# Altium PCB Smart-Switch-v1.2.PcbDoc (part 1 of 3)
Units mm, origin at the board's own origin, x right, y up, seen from the top; angles counter-clockwise.
Board outline 37 x 35 mm, 4 copper layers (Top Layer, Power Layer, Ground Layer, Bottom Layer), stack 0.999 mm thick; 78 components, 45 nets, 242 pads, 262 vias.
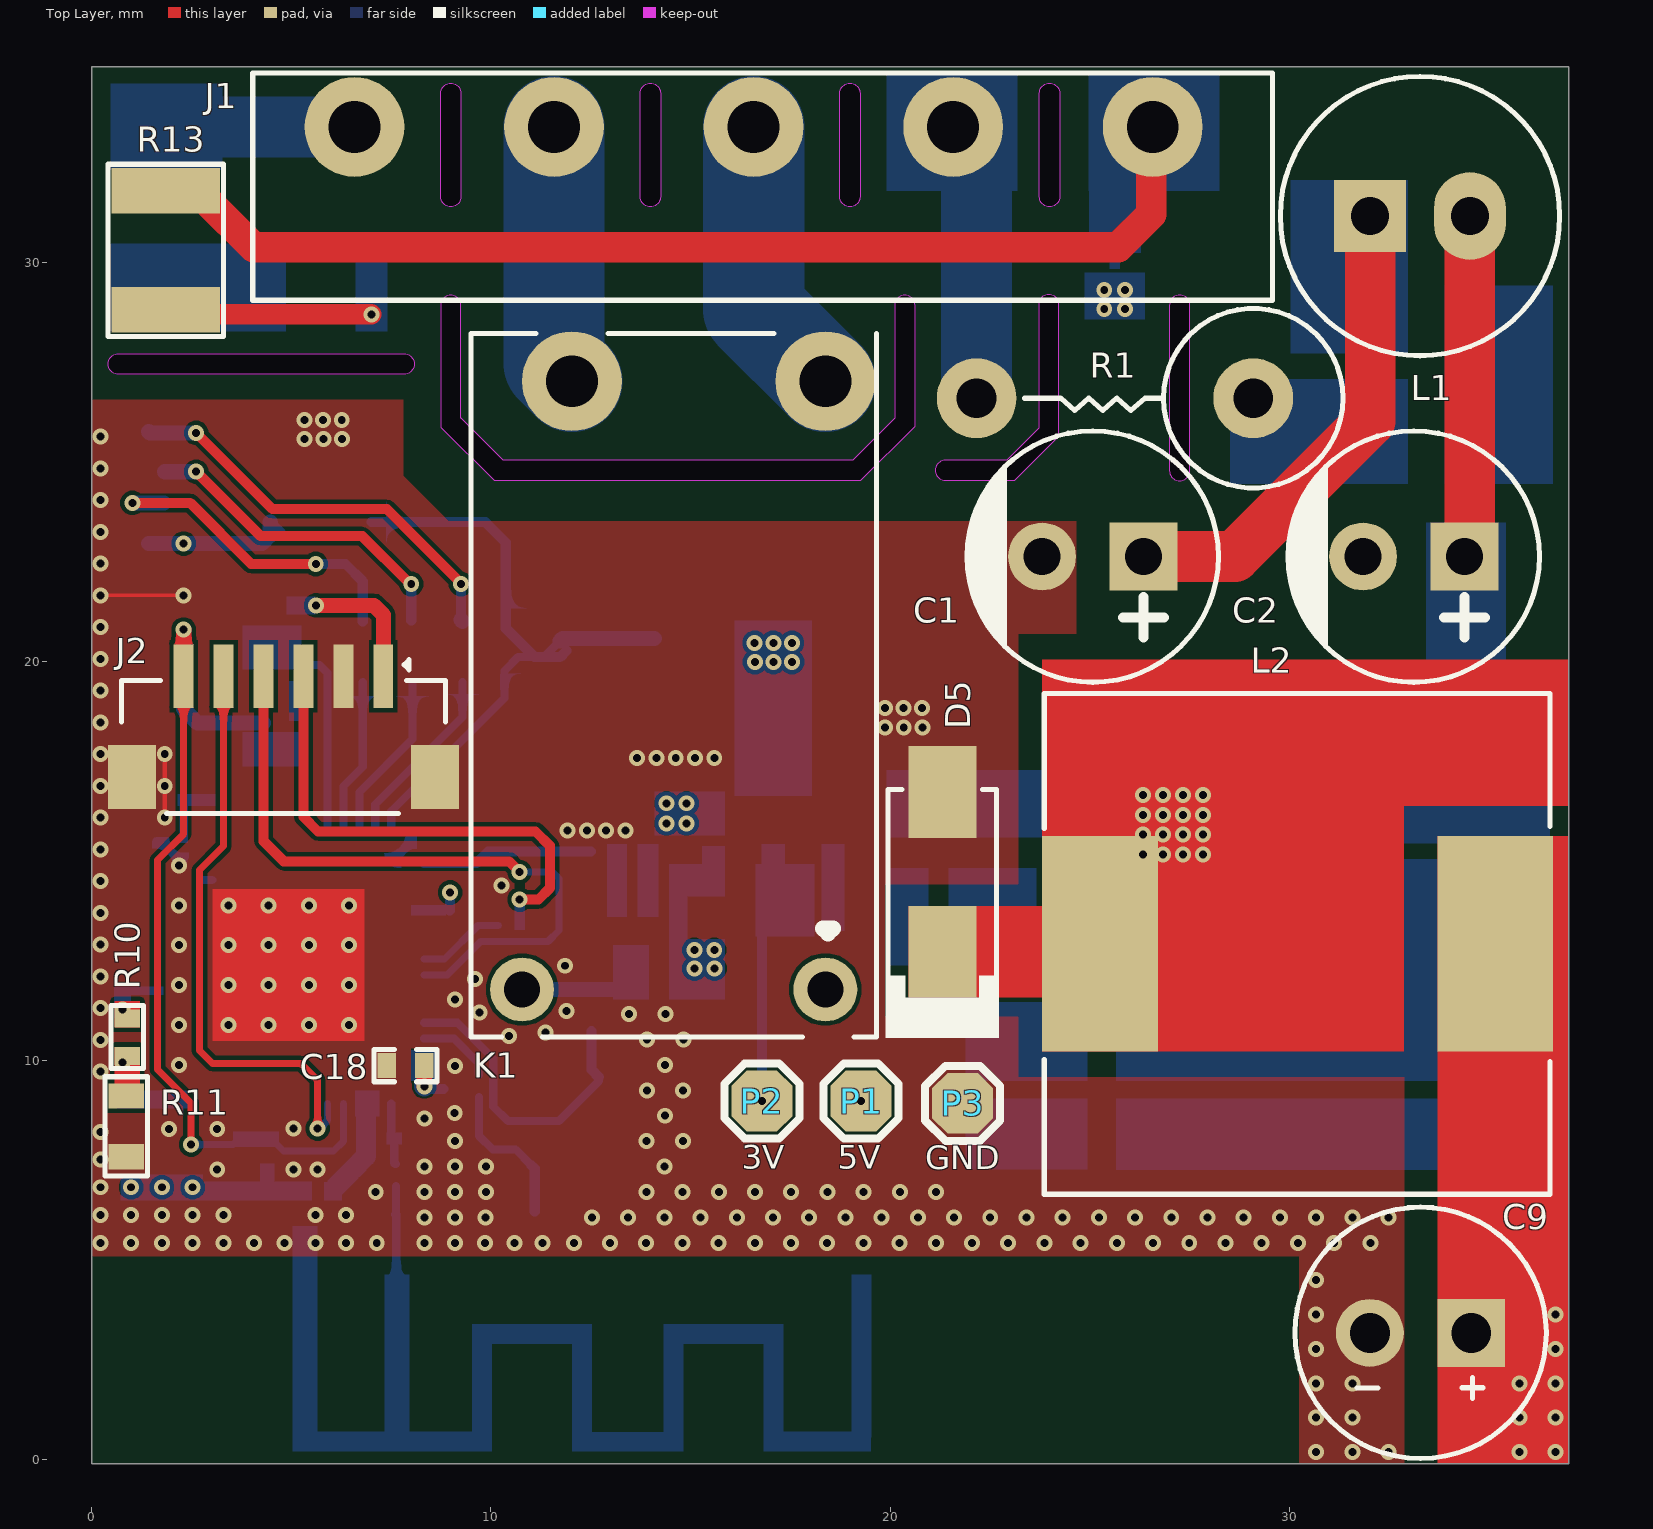
[diagram p0: Top Layer view]
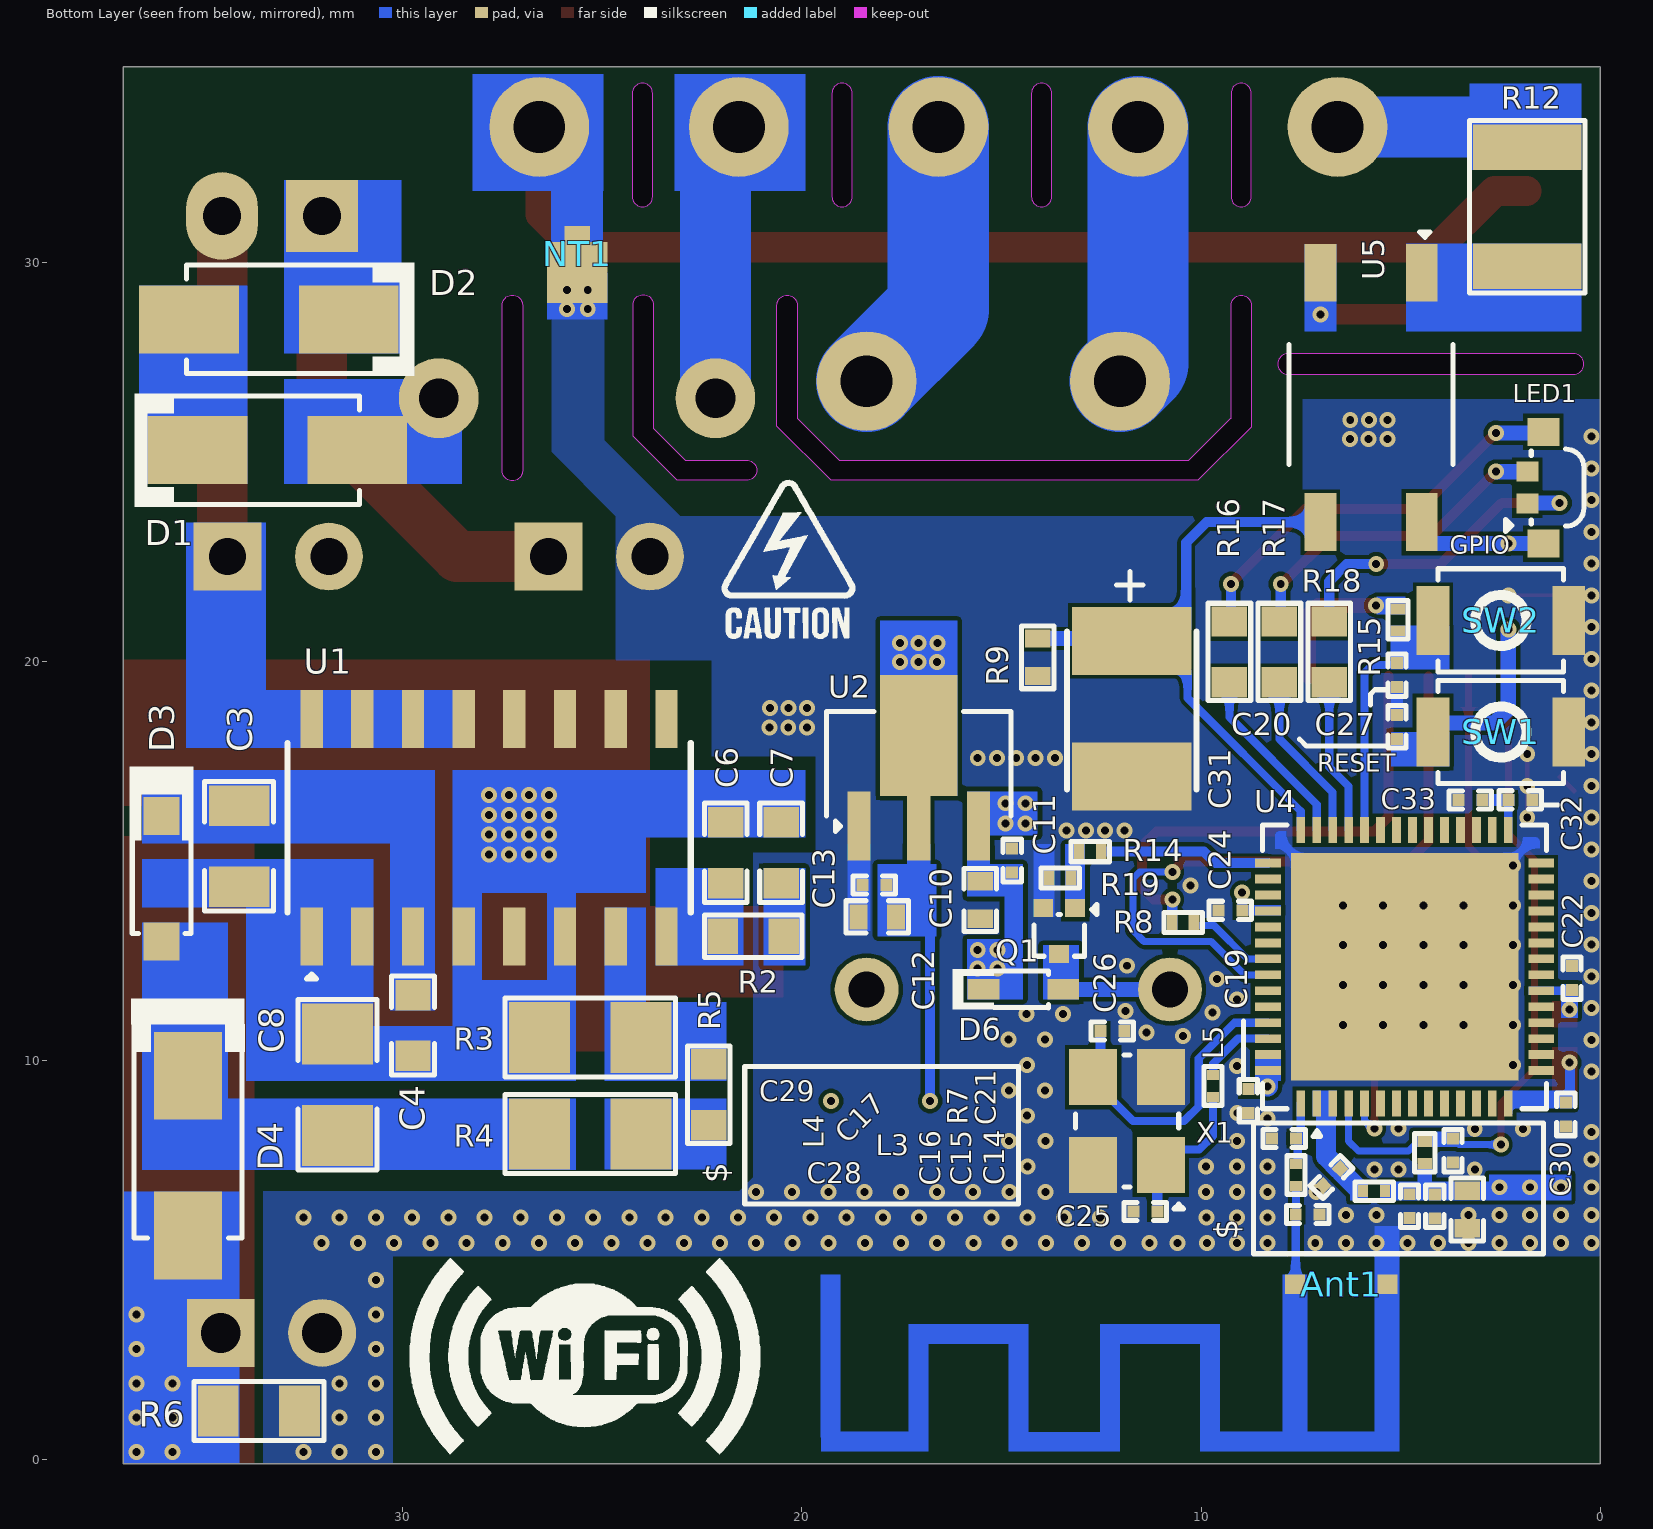
[diagram p1: Bottom Layer view, seen from below]
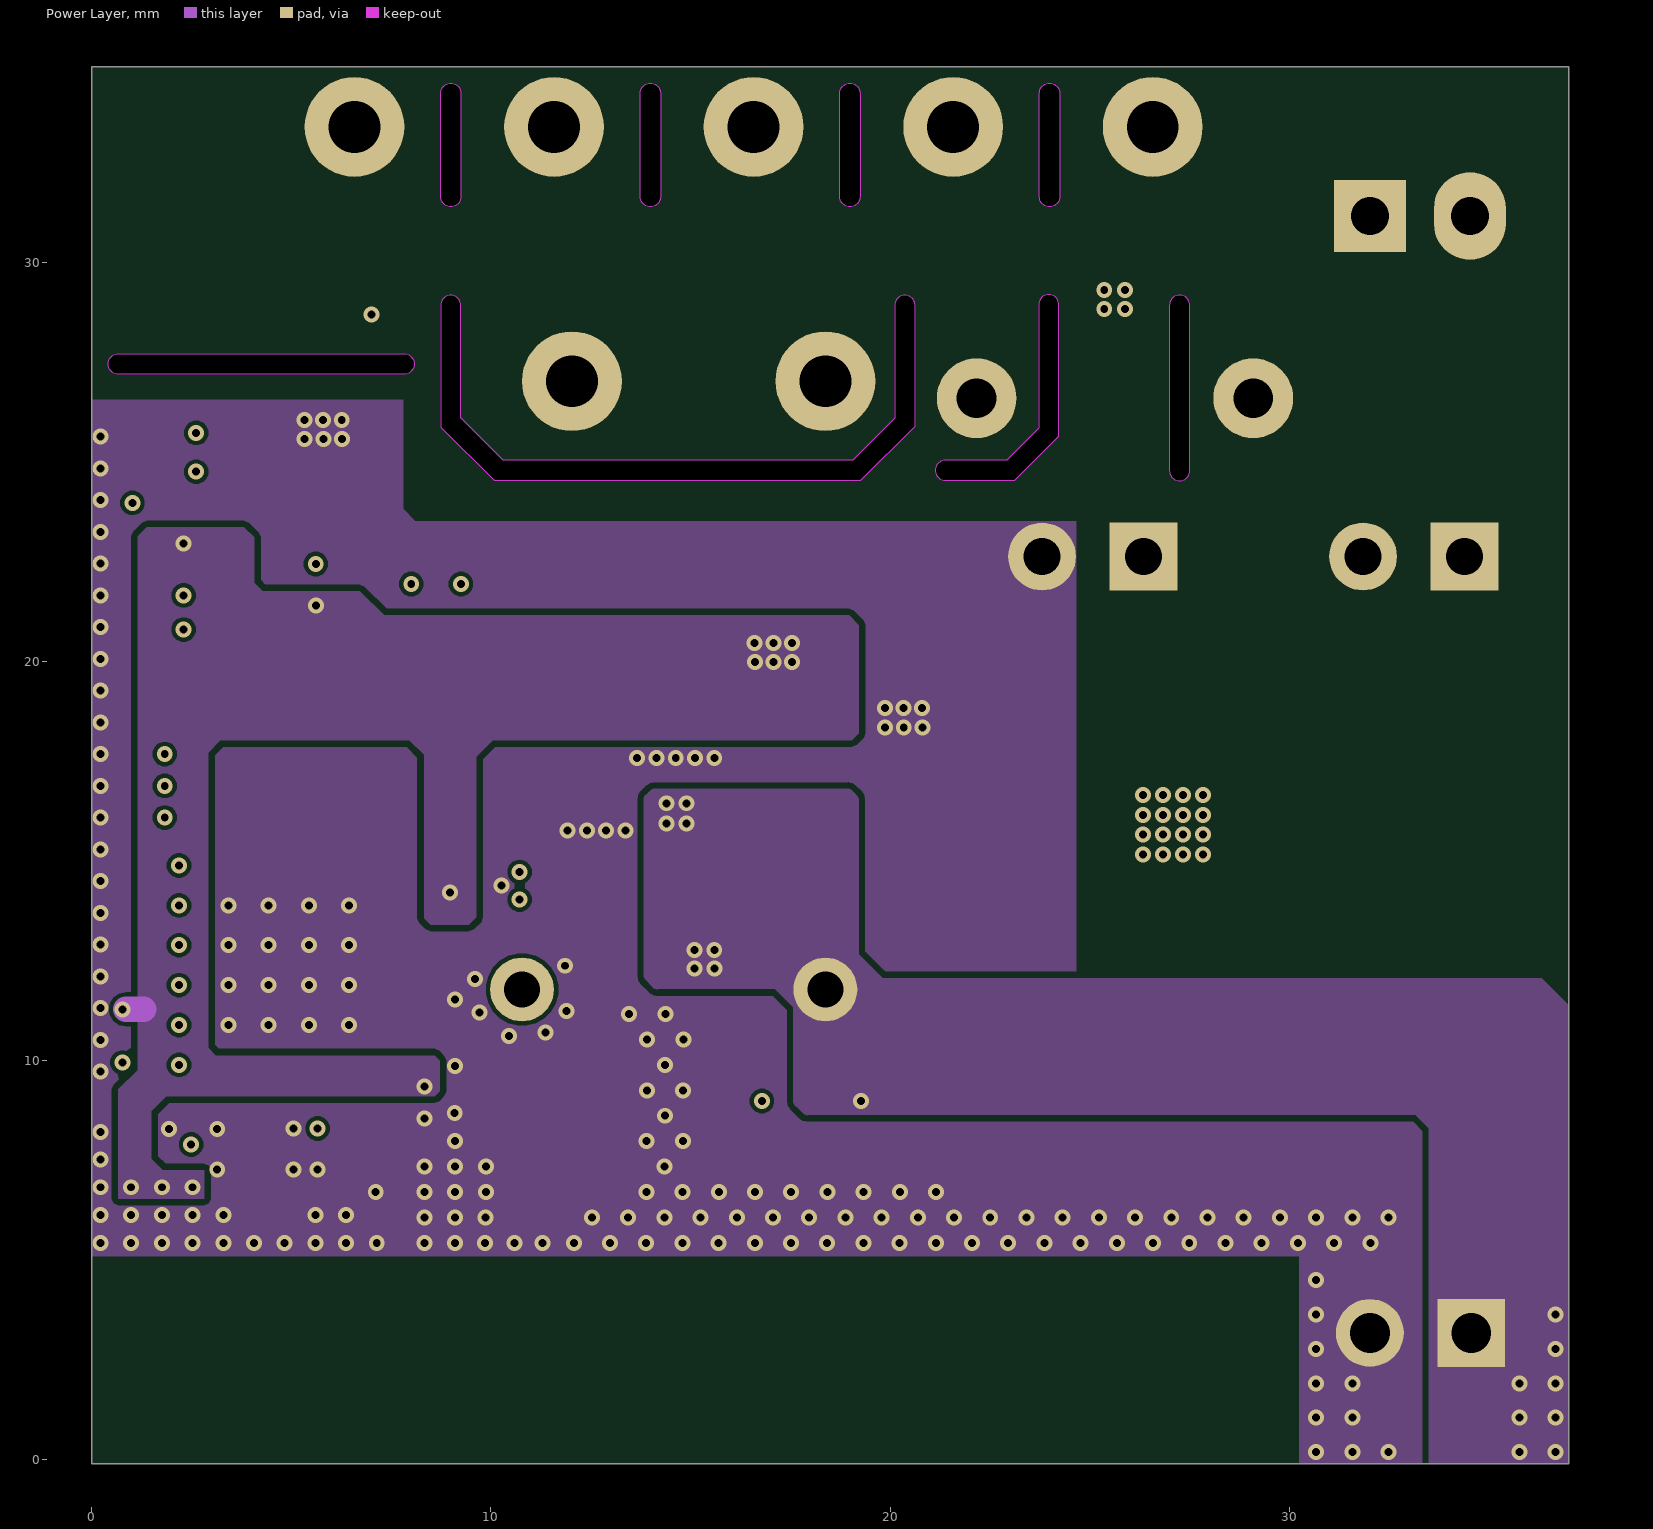
[diagram p2: Power Layer]
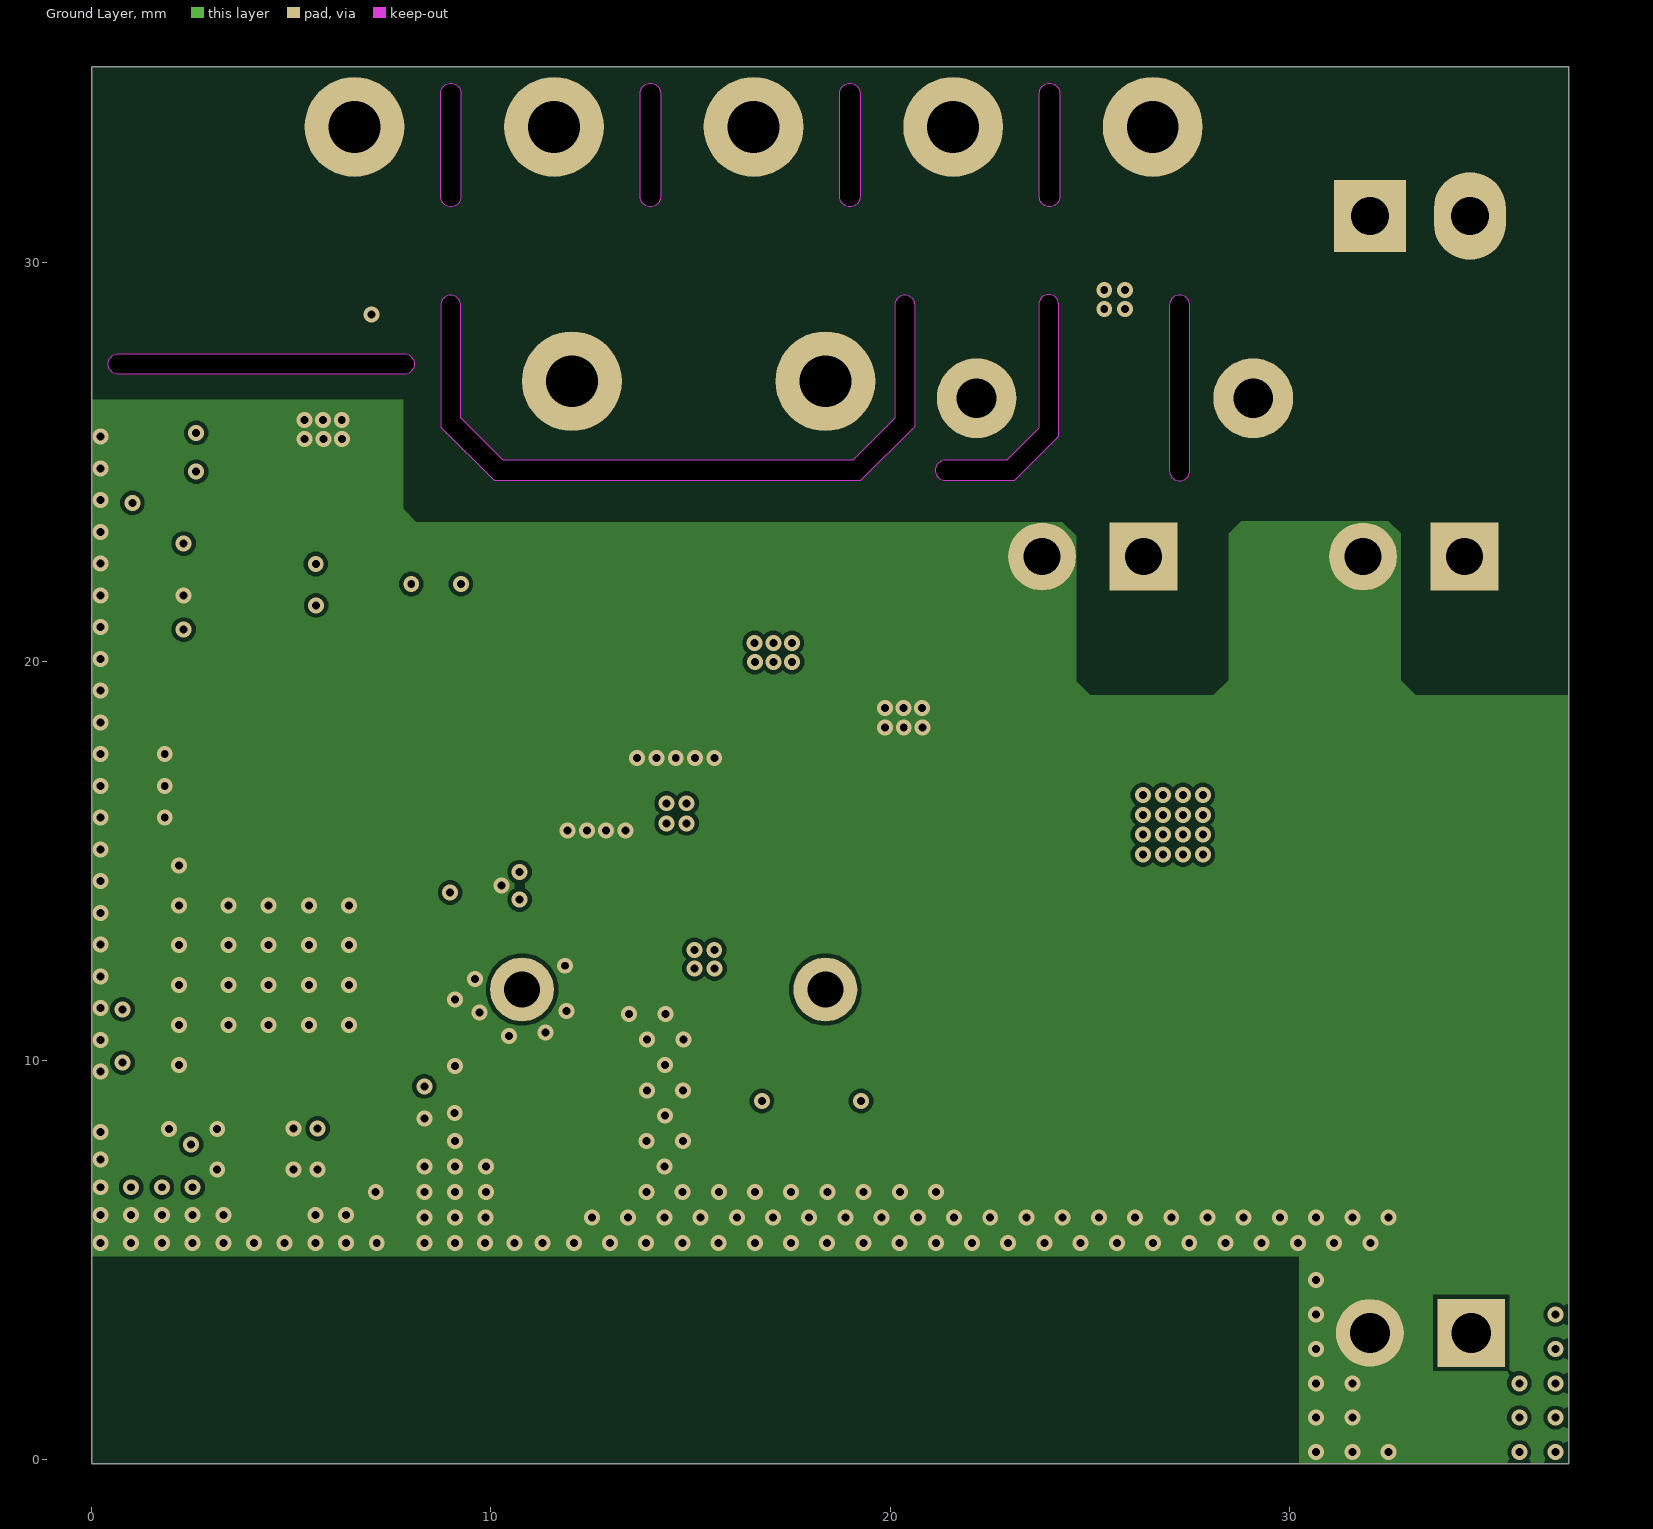
[diagram p3: Ground Layer]
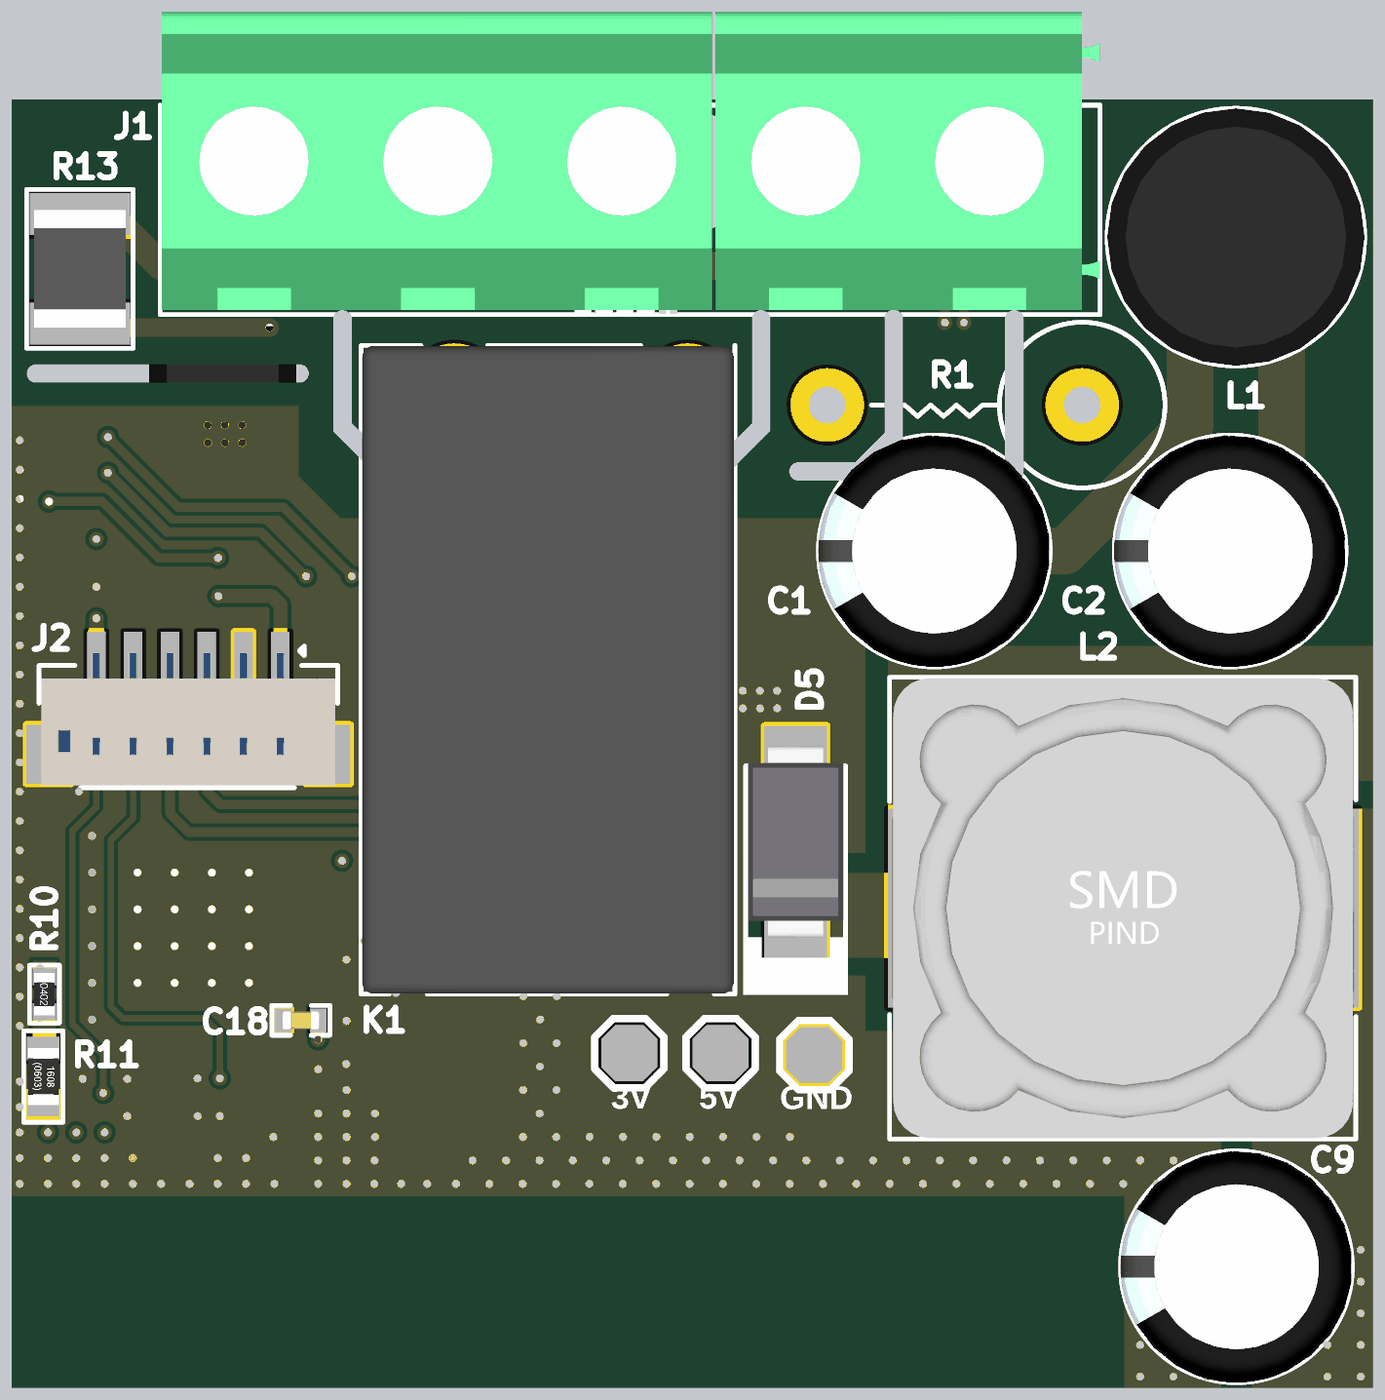
[diagram p5: 3D render of the assembled board from above, using the file's embedded part models]
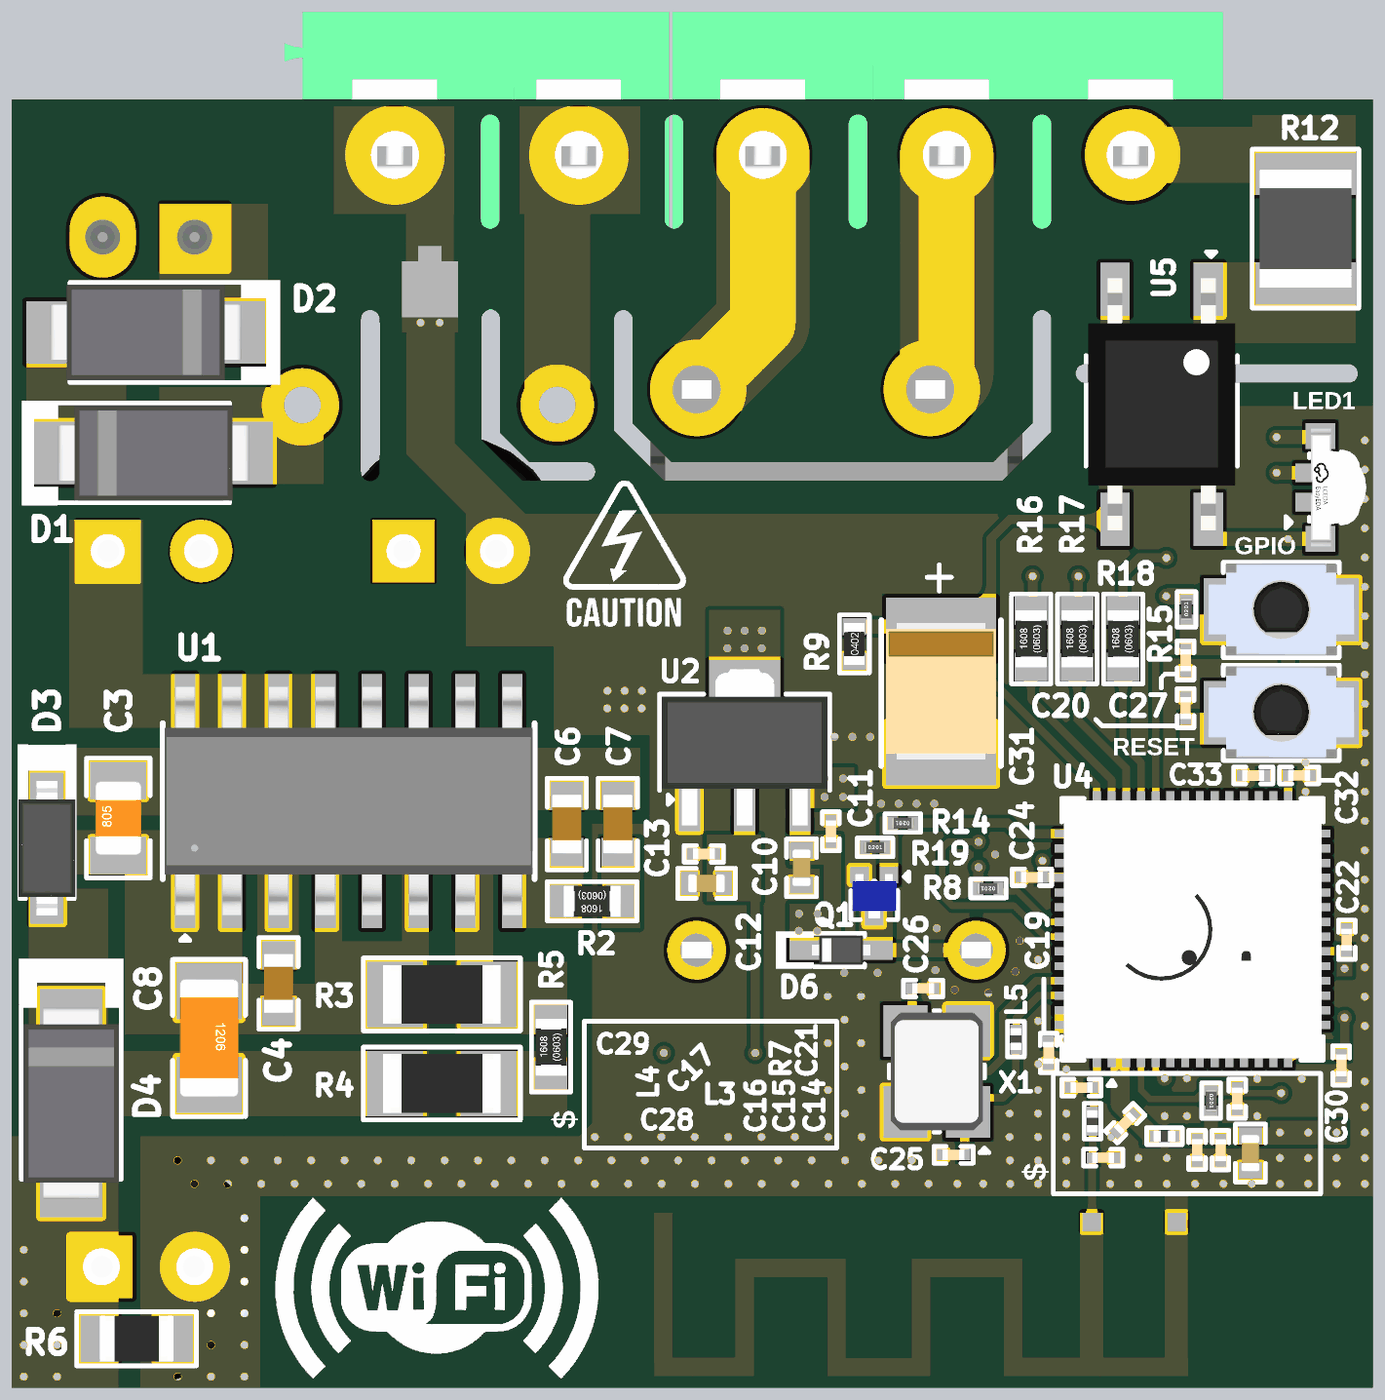
[diagram p6: 3D render of the assembled board from below, using the file's embedded part models]

## Layer stack, top to bottom
Top Solder: solder mask 0.0102, Solder Resist, Dk 3.8
Top Layer: signal copper 0.035
Dielectric 2: prepreg 0.1295, PP-006, Dk 4.6
Power Layer: signal copper 0.035
Dielectric 1: dielectric 0.6, FR-4, Dk 4.8
Ground Layer: signal copper 0.035
Dielectric 3: prepreg 0.1295, PP-006, Dk 4.6
Bottom Layer: signal copper 0.035
Bottom Solder: solder mask 0.0102, Solder Resist, Dk 3.8

## Board outline
0,-0.101 0,34.899 37,34.899 37,-0.101
cut-out: 27,24.784 ccw(c27.254,24.784) 27.254,24.53 ccw(c27.254,24.784) 27.508,24.784 27.508,28.931 ccw(c27.254,28.931) 27.254,29.185 ccw(c27.254,28.931) 27,28.931
cut-out: 8.74,25.878 10.079,24.54 19.263,24.54 20.626,25.903 20.626,28.928 ccw(c20.372,28.928) 20.372,29.182 ccw(c20.372,28.928) 20.118,28.928 20.118,26.094 19.071,25.048 10.312,25.048 9.258,26.102 9.248,26.102 9.248,28.928 ccw(c8.994,28.928) 8.994,29.182 ccw(c8.994,28.928) 8.74,28.928
cut-out: 21.134,24.794 ccw(c21.388,24.794) 21.388,24.54 23.119,24.54 24.232,25.652 24.232,28.944 ccw(c23.978,28.944) 23.978,29.198 ccw(c23.978,28.944) 23.724,28.944 23.724,25.844 22.928,25.048 21.388,25.048 ccw(c21.388,24.794)
cut-out: 0.66,27.203 cw(c0.66,27.457) 0.406,27.457 cw(c0.66,27.457) 0.66,27.711 7.824,27.711 cw(c7.824,27.457) 8.078,27.457 cw(c7.824,27.457) 7.824,27.203
cut-out: 8.995,31.394 cw(c8.995,31.648) 8.741,31.648 8.741,34.239 cw(c8.995,34.239) 8.995,34.493 cw(c8.995,34.239) 9.249,34.239 9.249,31.648 cw(c8.995,31.648)
cut-out: 13.995,31.394 cw(c13.995,31.648) 13.741,31.648 13.741,34.239 cw(c13.995,34.239) 13.995,34.493 cw(c13.995,34.239) 14.249,34.239 14.249,31.648 cw(c13.995,31.648)
cut-out: 18.995,31.394 cw(c18.995,31.648) 18.741,31.648 18.741,34.239 cw(c18.995,34.239) 18.995,34.493 cw(c18.995,34.239) 19.249,34.239 19.249,31.648 cw(c18.995,31.648)
cut-out: 23.995,31.394 cw(c23.995,31.648) 23.741,31.648 23.741,34.239 cw(c23.995,34.239) 23.995,34.493 cw(c23.995,34.239) 24.249,34.239 24.249,31.648 cw(c23.995,31.648)

## Design rules (kind name [scope] priority, off if disabled: settings)
Clearance [All] p1: gap=0.102 ignorepadtopadclearanceinfootprint=FALSE except(0.152: Poly-Poly)
ComponentClearance [All] p1: gap=0 collisioncheckmode=3 verticalgap=0 showdistances=FALSE
MinimumSolderMaskSliver [All] p1: minsoldermaskwidth=0
PolygonConnect [All] p1: connectstyle=Direct reliefconductorwidth=0.254 reliefentries=4 polygonreliefangle="45 Angle" airgapwidth=0.254
RoutingVias [All] p1: holewidth=0.2 width=0.4 viastyle="Through Hole" minholewidth=0.2 minwidth=0.4 maxholewidth=0.2 maxwidth=0.4
SilkToSilkClearance [All] p1: silktosilkclearance=0
SilkToSolderMaskClearance [IsPad] p1: minsilkscreentomaskgap=0 clearancetoexposedcopper=TRUE
SolderMaskExpansion [All] p1: expansion=0.102 istentingtop=FALSE
Width RF [InNetClass('RF')] p1: maxlimit=0.208 minlimit=0.132 preferedwidth=0.208 toplayer_minwidth=0.208 midlayer1_maxwidth=0.132 midlayer1_prefwidth=0.132 midlayer2_maxwidth=0.132 midlayer2_prefwidth=0.132 bottomlayer_minwidth=0.208 impedanceprofiledriven=TRUE impedanceprofileid={6EA76BCA-AD47-4699-BACC-62EAA46FC2F5} impedanceprofilevalue=50.000000 minimp=50.000000 maximp=50.000000 favimp=50.000000 // RF Impedance
Width [All] p2: maxlimit=2.54 minlimit=0.127 preferedwidth=0.254 minimp=50.000000 maximp=50.000000 favimp=50.000000
26 further rules are at their usual default settings.

## Classes and differential pairs
net class RF: NetAnt1_ANT# NetC29_2
component class U_Power-Sheet: 3 C1 C2 C3 C4 C6 C7 C8 C9 C10 C11 C12 C13 D1 D2 D3 D4 D5 J1 L1 L2 NT1 P1 P2 P3 R1 R2 R3 R4 R5 R6 SS U1 U2
component class U_Controller-Sheet: 2 Ant1 C14 C15 C16 C17 C18 C19 C20 C21 C22 C24 C25 C26 C27 C28 C29 C30 C31 C32 C33 D6 J2 K1 L3 L4 L5 LED1 Q1 R7 R8 R9 R10 R11 R12 R13 R14 R15 R16 R17 R18 R19 SW1 SW2 U4 U5 X1

## Components (designator, comment, footprint, x,y, rotation, side; value= is the part's Value field where it differs from the comment)
Ant1 "ESP Patch Anttena" "ESP Patch Antenna" 5.029,5.613 r0 bottom locked net-tie
C1 "6.8uF" KCXC1302G6R8MF 25.079,22.633 r180 top
C2 "6.8uF" KCXC1302G6R8MF 33.121,22.633 r180 top
C3 "4.7uF" Cap-0805 34.1,15.375 r90 bottom
C4 "100pF" Cap-0603 29.745,10.883 r90 bottom
C6 "330pF" Cap-0603 21.911,15.215 r270 bottom
C7 "22nF" Cap-0603 20.523,15.215 r270 bottom
C8 "220nF" Cap-1206 31.635,9.4 r270 bottom
C9 "680uF" SHW680UF10V6.3X11 33.292,3.182 r180 top
C10 "10uF" Cap-0402 15.529,14.026 r90 bottom
C11 "0.1uf" CAP-0201 14.732,15.016 r270 bottom value=100nF
C12 "10uF" Cap-0402 18.113,13.603 r180 bottom
C13 "0.1uf" CAP-0201 18.186,14.402 r180 bottom value=100nF
C14 "10uF" Cap-0402 3.327,6.274 r90 bottom
C15 "1uF" CAP-0201 4.141,6.351 r90 bottom
C16 "0.1uf" CAP-0201 4.776,6.355 r90 bottom value=100nF
C17 "0.1uf" CAP-0201 6.731,7.087 r135 bottom value=100nF
C18 "1uF" Cap-0402 7.86,9.881 r0 top
C19 "0.1uF" CAP-0201 8.815,8.994 r90 bottom value=100nF
C20 "0.1uf" CAP-0201 5.091,18.364 r270 bottom value=100nF
C21 "1uF" CAP-0201 3.688,7.749 r90 bottom
C22 "0.1uf" CAP-0201 0.707,12.069 r270 bottom value=100nF
C24 "0.1uf" CAP-0201 9.267,13.768 r180 bottom value=100nF
C25 "22PF" CAP-0201 11.397,6.223 r180 bottom value=22pF
C26 "22PF" CAP-0201 12.223,10.744 r0 bottom value=22pF
C27 "0.1uf" CAP-0201 5.091,19.663 r90 bottom value=100nF
C28 "2.7pF" CAP-0201 7.328,6.147 r0 bottom
C29 "4.7pF" CAP-0201 7.92,8.052 r180 bottom
C30 "0.1uF" CAP-0201 0.86,8.654 r90 bottom value=100nF
C31 "33uF" Case-B 11.735,18.82 r270 bottom
C32 "0.1uF" CAP-0201 2.002,16.537 r0 bottom value=100nF
C33 "1uF" CAP-0201 3.251,16.535 r180 bottom
D1 "MRA4007T3G" SMA#1 33.143,25.298 r180 bottom
D2 "MRA4007T3G" SMA#1 33.357,28.575 r0 bottom
D3 "BAT46ZFILM" SOD-123 36.043,14.558 r90 bottom value=10pF
D4 "STTH1L06A" SMA#2 35.382,7.625 r270 bottom
D5 "STTH1L06A" SMA#3 21.311,14.732 r90 top
D6 "1N4148WT" SOD-523F 14.453,11.789 r0 bottom
J1 "WJ127-5.0-5P" WJ127-5.0-5P 16.581,33.398 r180 top locked
J2 "Voltlink Target" "Voltlink Target" 4.802,18.372 r180 top
K1 "HF32FA-G/005-HSL1" HF32FA-G/005-HSL1 14.58,19.406 r90 top locked
L1 "1mH" SPK0608-102MB 33.278,31.164 r0 top locked
L2 "470uH" SMDRI127-471MT 30.213,12.929 r0 top
L3 "2nH" IND-0201 5.664,6.731 r0 bottom
L4 "1.6nH" IND-0201 7.62,7.137 r90 bottom
L5 "24nH" IND-0201 9.703,9.368 r270 bottom
LED1 "MHS110FRGBCT" MHS110FRGBCT 1.626,24.359 r270 bottom
NT1 "DNP" "Net Tie Pad" 25.628,30.221 r270 bottom net-tie
P1 "TEST POINT" Test-point 19.272,8.992 r270 top
P2 "TEST POINT" Test-point 16.789,8.992 r270 top
P3 "TEST POINT" Test-point 21.819,8.934 r270 top
Q1 "MMBT3904M" SOT-723 13.554,13.253 r0 bottom
R1 "10R" "MO2WS VERTICAL TYPE" 29.1,26.6 r180 top
R2 "220K" Res-0603#1 21.222,13.117 r180 bottom
R3 "22K" Res-1206 25.306,10.583 r180 bottom
R4 "22K" Res-1206 25.306,8.161 r0 bottom
R5 "56K" Res-0603#1 22.339,9.151 r270 bottom
R6 "5.6K" RES-0805 33.604,1.224 r0 bottom value=5.6kR
R7 "10K" Res-0201 4.394,7.699 r270 bottom
R8 "499R" Res-0201 10.45,13.464 r0 bottom
R9 "1K" Res-0402 14.094,20.108 r90 bottom
R10 "10K" Res-0402 0.889,10.592 r270 top
R11 "10k" Res-0603#2 0.86,8.354 r90 top value=10kR
R12 "33K" Res_1210 1.829,31.394 r270 bottom
R13 "33K" Res_1210 1.854,30.302 r270 top
R14 "4.7K" Res-0201 12.776,15.24 r0 bottom
R15 "10K" Res-0201 5.066,21.047 r90 bottom
R16 "240R" Res-0603#1 9.289,20.244 r270 bottom
R17 "100R" RES-0603 8.035,20.244 r270 bottom
R18 "100R" RES-0603 6.788,20.244 r270 bottom
R19 "47K" Res-0201 13.533,14.58 r180 bottom value=47kR
SW1 "B3U-1000P" B3U-1000P 2.489,18.237 r0 bottom
SW2 "B3U-1000P" B3U-1000P 2.489,21.031 r0 bottom
U1 "VIPER319XDTR" SOP-16 27.84,15.836 r90 bottom
U2 "LD1117AG-33-AB3-A-R" SOT-89-3 17.074,17.019 r180 bottom
U4 "ESP32-S3FH4R2" "QFNWB-56 (7×7)" 4.902,12.354 r90 bottom
U5 "PS2705-1-F3-A" SOP-4_2.54 5.74,26.619 r270 bottom
X1 "40MHz" X322540MPB4SI_ 11.855,8.49 r90 bottom value=40MHZ

## Footprints (in the part's own frame and the unit in brackets; to place one, negate y for a bottom-side part, rotate by r counter-clockwise, add the part's x,y. Pads: shape width x height; smd on the part's side, far side on the other; paste and mask are expansions set on the pad)
B3U-1000P [mm] "SWITCH TACTILE SPST-NO 0.05A 12V"
  rect 0.82x1.72 smd: 1(-1.7,0) 2(1.7,0)
  silkscreen extent -1.57,-1.3 1.57,1.3, body extent -2,-1.26 2,1.24, height 1.6
CAP-0201 [mm]
  rect 0.3x0.3 smd mask+0.055: 1(-0.3,0) 2(0.3,0)
  silkscreen extent -0.53,-0.23 0.53,0.23, body extent -0.3,-0.15 0.3,0.15, height 0.28
Cap-0402 [mil]
  rect 18x25 smd mask+2.36: 1(-18.5,0) 2(18.5,0)
  silkscreen extent -31,-16 31,16, body extent -20,-10 20,10, height 19
Cap-0603 [mil]
  rect 30x35 smd mask+2.36: 1(-30,0) 2(30,0)
  silkscreen extent -49,-21 49,21, body extent -32,-16 31,16, height 34
Cap-0805 [mil] "SMD 0805"
  rect 40x60 smd mask+2.76: 1(-40,0) 2(40,0)
  silkscreen extent -64,-34 64,34, body extent -39,-25 39,25, height 30
Cap-1206 [mil] "SMD 1206"
  rect 60x70 smd: 1(-50,0) 2(50,0)
  silkscreen extent -84,-39 84,39, body extent -63,-31 63,32, height 39
Case-B [mm]
  rect 1.7x3 smd paste+0: 1(-1.7,0) 2(1.7,0)
  silkscreen extent -1.93,-1.63 2.03,1.63, body extent -1.85,-1.5 1.85,1.5, height 2.16
"ESP Patch Antenna" [mm]
  rect 0.5x0.5 smd: ANT#(2.616,1.213) GND(0.305,1.213)
  Top Layer region: 14.498,5.405 14.498,4.905 11.798,4.905 11.798,5.405
  Top Layer region: 12.3,2.21 11.8,2.21 11.8,5.055 12.3,5.055
  Top Layer region: 9.648,2.209 9.648,2.709 11.959,2.709 11.959,2.209
  Top Layer region: 9.3,5.029 9.8,5.029 9.8,2.21 9.3,2.21
  Top Layer region: 9.796,5.409 9.796,4.909 6.996,4.909 6.996,5.409
  Top Layer region: 7.5,2.21 7,2.21 7,5.029 7.5,5.029
  Top Layer region: 4.873,2.209 4.873,2.709 7.133,2.709 7.133,2.209
  Top Layer region: 4.5,5.029 5,5.029 5,2.21 4.5,2.21
  Top Layer region: 2.3,5.029 2.93,5.029 2.93,0.963 2.3,0.963
  Top Layer region: -0.002,4.905 -0.002,5.405 4.998,5.405 4.998,4.905
  Top Layer region: 0,5.029 0.63,5.029 0.63,0.963 0,0.963
  Top Layer region: 14.005,5.055 14.505,5.055 14.505,0.963 14.005,0.963
HF32FA-G/005-HSL1 [mm]
  round 1.6 hole 0.9: 1(-7.62,-3.8) 2(-7.62,3.8)
  round 2.5 hole 1.3: 3(7.62,2.55) 4(7.62,-3.8)
  silkscreen extent -8.81,-5.08 8.81,5.08, body extent -8.8,-5.05 8.8,5.06, height 12.6
IND-0201 [mm]
  rect 0.25x0.3 smd mask+0.055: 1(-0.275,0) 2(0.275,0)
  silkscreen extent -0.48,-0.23 0.48,0.23, body extent -0.3,-0.15 0.3,0.15, height 0.15
KCXC1302G6R8MF [mm]
  rect 1.7x1.7 hole 0.92 paste+0 mask+0.051: 1(-1.27,0)
  round 1.7 hole 0.92 paste+0 mask+0.051: 2(1.27,0)
  silkscreen extent -3.15,-3.15 3.17,3.15, body extent -3.15,-3.15 3.16,3.15, height 12.11
MHS110FRGBCT [mm]
  rect 0.7x0.8 smd: 1(1.4,0.2) 4(-1.4,0.2)
  rect 0.5x0.55 smd: 2(0.4,-0.2) 3(-0.4,-0.2)
  silkscreen extent -0.91,-0.1 0.91,-0.1, body extent -1.6,-0.05 1.6,1.45, height 1.01
"MO2WS VERTICAL TYPE" [mm]
  round 2 hole 1: 1(0,0) 2(6.93,0)
  silkscreen extent -2.25,-2.25 5.73,2.25, body extent -2.26,-2.29 7.42,2.26, height 15.22
"Net Tie Pad" [mil]
  rect 18x25 smd mask-10: 1(-18.5,0)
  rect 60x60 smd mask-10: 2(18.5,0)
  Top Layer region: -15,5 15,5 15,-5 -15,-5
"QFNWB-56 (7×7)" [mm]
  rect 0.65x0.22 smd: 1(-3.425,2.6) 2(-3.425,2.2) 3(-3.425,1.8) 4(-3.425,1.4) 5(-3.425,1) 6(-3.425,0.6) 7(-3.425,0.2) 8(-3.425,-0.2) 9(-3.425,-0.6) 10(-3.425,-1) 11(-3.425,-1.4) 12(-3.425,-1.8) 13(-3.425,-2.2) 14(-3.425,-2.6) 29(3.425,-2.6) 30(3.425,-2.2) 31(3.425,-1.8) 32(3.425,-1.4) 33(3.425,-1) 34(3.425,-0.6) 35(3.425,-0.2) 36(3.425,0.2) 37(3.425,0.6) 38(3.425,1) 39(3.425,1.4) 40(3.425,1.8) 41(3.425,2.2) 42(3.425,2.6)
  rect 0.22x0.65 smd: 15(-2.6,-3.425) 16(-2.2,-3.425) 17(-1.8,-3.425) 18(-1.4,-3.425) 19(-1,-3.425) 20(-0.6,-3.425) 21(-0.2,-3.425) 22(0.2,-3.425) 23(0.6,-3.425) 24(1,-3.425) 25(1.4,-3.425) 26(1.8,-3.425) 27(2.2,-3.425) 28(2.6,-3.425) 43(2.6,3.425) 44(2.2,3.425) 45(1.8,3.425) 46(1.4,3.425) 47(1,3.425) 48(0.6,3.425) 49(0.2,3.425) 50(-0.2,3.425) 51(-0.6,3.425) 52(-1,3.425) 53(-1.4,3.425) 54(-1.8,3.425) 55(-2.2,3.425) 56(-2.6,3.425)
  rect 5.7x5.7 smd: 57(0,0)
  silkscreen extent -3.56,-3.56 3.56,3.56, body extent -3.5,-3.51 3.5,3.49, height 0.92
Res-0201 [mm]
  rect 0.27x0.37 smd mask+0.055: 1(-0.275,0) 2(0.275,0)
  silkscreen extent -0.48,-0.25 0.48,0.25, body extent -0.3,-0.15 0.3,0.15, height 0.29
Res-0402 [mil]
  rect 18x25 smd mask+2.17: 1(-18.5,0) 2(18.5,0)
  silkscreen extent -32,-17 32,16, body extent -23,-11 23,11, height 16
Res-0603#1 [mil]
  rect 30x35 smd: 1(-30,0) 2(30,0)
  silkscreen extent -48,-21 48,21, body extent -31,-17 31,17, height 18
Res-0603#2 [mil]
  rect 25x35 smd: 1(-30,0) 2(30,0)
  silkscreen extent -49,-21 49,21, body extent -31,-17 31,17, height 18
RES-0603 [mil]
  rect 30x35 smd: 1(-30,0) 2(30,0)
  silkscreen extent -48,-21 48,21, body extent -31,-17 31,17, height 18
RES-0805 [mil] "SMD 0805"
  rect 40x50 smd: 1(-40,0) 2(40,0)
  silkscreen extent -64,-29 64,29, body extent -39,-25 39,24, height 24
Res-1206 [mil]
  rect 60x70 smd: 1(-50,0) 2(50,0)
  silkscreen extent -84,-39 84,39, body extent -63,-31 63,31, height 24
Res_1210 [mm]
  rect 1.14x2.72 smd: 1(-1.49,0) 2(1.49,0)
  silkscreen extent -2.16,-1.45 2.16,1.45, body extent -1.6,-1.25 1.6,1.25, height 0.7
SHW680UF10V6.3X11 [mm]
  rect 1.7x1.7 hole 1: 1(-1.27,0)
  round 1.7 hole 1: 2(1.27,0)
  silkscreen extent -3.15,-3.15 3.15,3.15, body extent -3.16,-3.15 3.16,3.15, height 11.21
SMA#1 [mm]
  rect 2.5x1.7 smd: 1(-2,0) 2(2,0)
  silkscreen extent -3.59,-1.42 2.06,1.42, body extent -2.6,-1.3 2.6,1.3, height 2.4
SMA#2 [mm]
  rect 2.2x1.7 smd: 1(-2,0) 2(2,0)
  silkscreen extent -3.93,-1.42 2.06,1.42, body extent -2.6,-1.3 2.6,1.3, height 2.4
SMA#3 [mm]
  rect 2.3x1.7 smd: 1(-2,0) 2(2,0)
  silkscreen extent -4.16,-1.42 2.06,1.42, body extent -2.6,-1.3 2.6,1.3, height 2.4
SMDRI127-471MT [mm]
  rect 2.9x5.4 smd: 1(-4.95,0) 2(4.95,0)
  silkscreen extent -6.35,-6.27 6.32,6.27, body extent -6.28,-6.25 6.28,6.25, height 8
SOD-123 [mm]
  rect 0.95x0.9 smd: 1(-1.575,0) 2(1.575,0)
  silkscreen extent -1.37,-0.8 2.82,0.8, body extent -1.82,-0.77 1.83,0.78, height 1.5
SOD-523F [mm]
  rect 0.8x0.52 smd: 1(-1,0) 2(1,0)
  silkscreen extent -0.64,-0.51 1.78,0.51, body extent -0.8,-0.4 0.8,0.4, height 0.7
SOP-4_2.54 [mm]
  rect 1.45x0.8 smd: 1(-3.125,1.27) 2(-3.125,-1.27) 3(3.125,-1.27) 4(3.125,1.27)
  silkscreen extent -4.14,-2.06 1.68,2.06, body extent -3.43,-2 3.43,2, height 2.02
SOP-16 [mil]
  rect 57.55x22 smd: 1(-107.27,175) 2(-107.27,125) 3(-107.27,75) 4(-107.27,25) 5(-107.27,-25) 6(-107.27,-75) 7(-107.27,-125) 8(-107.27,-175) 9(107.27,-175) 10(107.27,-125) 11(107.27,-75) 12(107.27,-25) 13(107.27,25) 14(107.27,75) 15(107.27,125) 16(107.27,175)
  silkscreen extent -149,-199 84,199, body extent -122,-197 122,197, height 69
SOT-89-3 [mm]
  rect 0.58x1.73 smd: 1(-1.5,-1.132) 2(0,-1.132) 3(1.5,-1.132)
  rect 1.933x3.03 smd: 2(0,1.132)
  silkscreen extent -2.31,-1.27 2.31,1.73, body extent -2.25,-1.84 2.25,2.41, height 1.54
SOT-723 [mm]
  rect 0.5x0.45 smd: 1(-0.4,-0.575) 2(0.4,-0.575) 3(0,0.575)
  silkscreen extent -0.94,-0.66 0.64,0.64, body extent -0.6,-0.6 0.6,0.6, height 0.5
SPK0608-102MB [mm]
  rect 1.8x1.8 hole 0.95: 1(-1.25,0)
  oval 1.8x2.2 hole 0.95: 2(1.25,0)
  silkscreen extent -3.5,-3.5 3.5,3.5, body extent -3.5,-3.49 3.5,3.49, height 11
Test-point [mil]
  oct 60x60 smd: 1(0,0)
  silkscreen extent -37,-37 37,37
"Voltlink Target" [mm]
  rect 0.5x1.6 smd: 1(-2.5,-1.262) 2(-1.5,-1.262) 3(-0.5,-1.262) 4(0.5,-1.262) 5(1.5,-1.262) 6(2.5,-1.262)
  rect 1.2x1.6 smd: MP1(-3.8,1.262) MP2(3.8,1.262)
  silkscreen extent -4.06,-1.68 4.06,2.17, body extent -4,-1.49 4,2.11, height 4.25
WJ127-5.0-5P [mm]
  round 2.5 hole 1.3: 1(-10,0) 2(-5,0) 3(0,0) 4(5,0) 5(10,0)
  silkscreen extent -13,-1.35 12.55,4.34, body extent -13,-3.88 12.5,4.32, height 10.1
X322540MPB4SI_ [mm]
  rect 1.4x1.2 smd: 1(-1.1,-0.85) 2(1.1,-0.85) 3(1.1,0.85) 4(-1.1,0.85)
  silkscreen extent -1.65,-1.3 1.65,1.3, body extent -1.6,-1.25 1.6,1.25, height 0.8

## Part data
Ant1: "ESP32 MIFA PCB ANTENNA", Item Type=Antenna, Manufacturer Part Number="ESP Patch Anttena"
C1 C2: library part KCXC1302G6R8MF, "6.8uF 400V ±20% Plugin,D6.3xL13mm Aluminum Electrolytic Capacitors - Leaded ROHS", LCSC Part Number=C781275, Manufacturer=Ymin, Package=Plugin,D6.3xL13mm, ComponentLink1Description=LCSC, ComponentLink1URL=https://www.lcsc.com/product-detail/Aluminum-Electrolytic-Capacitors-Leaded_Ymin-KCXC1302G6R8MF_C781275.html, Item Type=Capacitor, Manufacturer Part Number=KCXC1302G6R8MF
C3: library part GRM21BR61H475KE51L, "CAP CER 4.7UF 50V X5R 0805", Case Code (Imperial)=0805, Case Code (Metric)=2012, Dielectric=X5R, LCSC Part Number=C162420, Manufacturer=Murata, Max Operating Temperature=85°C, Min Operating Temperature=-55°C, Supplier Part Number 1=1138707P, Tolerance=10%, Voltage Rating=50V, Capacitance=4.7uF, Case/Package=0805, Category="Ceramic Capacitors", ComponentLink1Description=http://www.farnell.com/datasheets/2079186.pdf?src-supplier=Farnell, ComponentLink1URL=http://www.farnell.com/datasheets/2079186.pdf?src-supplier=Farnell, ComponentLink2Description=http://components.arrow.com/part/dataview/61084395S454511N2606?src-supplier=Arrow+Electronics, ComponentLink2URL=http://components.arrow.com/part/dataview/61084395S454511N2606?src-supplier=Arrow+Electronics, ComponentLink3Description=http://www.farnell.com/datasheets/2079186.pdf?src-supplier=Element14, ComponentLink3URL=http://www.farnell.com/datasheets/2079186.pdf?src-supplier=Element14, ComponentLink4Description=http://search.murata.co.jp/Ceramy/image/img/A01X/G101/ENG/GRM21BR61H475KE51-01.pdf?src-supplier=Digi-Key, ComponentLink4URL=http://search.murata.co.jp/Ceramy/image/img/A01X/G101/ENG/GRM21BR61H475KE51-01.pdf?src-supplier=Digi-Key, ComponentLink5Description=https://search.murata.co.jp/Ceramy/image/img/A01X/G101/ENG/GRM21BR61H475KE51-01.pdf?src-supplier=Digi-Key, ComponentLink5URL=https://search.murata.co.jp/Ceramy/image/img/A01X/G101/ENG/GRM21BR61H475KE51-01.pdf?src-supplier=Digi-Key, ComponentLink6Description=http://www.farnell.com/datasheets/2079186.pdf?src-supplier=Newark, ComponentLink6URL=http://www.farnell.com/datasheets/2079186.pdf?src-supplier=Newark, Depth=1.25mm, Height=1.25mm, Item Type=Capacitor, Lead Free="Lead Free", Length=2mm, Manufacturer Part Number=GRM21BR61H475KE51L, Material=Ceramic, Mount="Surface Mount", Packaging="Tape and Reel", Pricing 1="500=0.09400, 1000=0.08800, 2000=0.08300, 5000=0.07500 (GBP)", Reach SVHC Compliant=Yes, RoHS=Yes, RoHS Compliant=Yes, Series=GRM, Stock 1=37300, Supplier 1=Rs, Thickness=0.055inch, Voltage Rating (DC)=50V, Width=0.049inch
C4: library part CC0603JRNPO9BN101, "CAP CER 100PF 50V C0G/NPO 0603", Case Code (Imperial)=0603, Case Code (Metric)=1608, Dielectric=C0G, Insulation Resistance=100GR, LCSC Part Number=C14665, Manufacturer=Yageo, Max Operating Temperature=125°C, Min Operating Temperature=-55°C, Package Quantity=1, Resistor Type=Ceramic, Temperature Coefficient=30ppm/°C, Tolerance=5%, Voltage=50V, Capacitance=100pF, Case/Package=0603, Category="Ceramic Capacitors", ComponentLink1Description=https://datasheet.ciiva.com/11786/0900766b8079c870-11786060.pdf?src-supplier=RSComponents, ComponentLink1URL=https://datasheet.ciiva.com/11786/0900766b8079c870-11786060.pdf?src-supplier=RSComponents, ComponentLink2Description=https://datasheet.ciiva.com/7978/1443161-7978127.pdf?src-supplier=Element14, ComponentLink2URL=https://datasheet.ciiva.com/7978/1443161-7978127.pdf?src-supplier=Element14, ComponentLink3Description=https://datasheet.ciiva.com/28450/1443161-28450457.pdf?src-supplier=Element14, ComponentLink3URL=https://datasheet.ciiva.com/28450/1443161-28450457.pdf?src-supplier=Element14, ComponentLink4Description=https://datasheet.ciiva.com/46430/1835847-46430151.pdf?src-supplier=Element14, ComponentLink4URL=https://datasheet.ciiva.com/46430/1835847-46430151.pdf?src-supplier=Element14, ComponentLink5Description=https://datasheet.ciiva.com/144/mlccorderingcode-144629.pdf?src-supplier=Digi-Key, ComponentLink5URL=https://datasheet.ciiva.com/144/mlccorderingcode-144629.pdf?src-supplier=Digi-Key, ComponentLink6Description=https://datasheet.ciiva.com/144/mlccorderingcode-144628.pdf?src-supplier=Digi-Key, ComponentLink6URL=https://datasheet.ciiva.com/144/mlccorderingcode-144628.pdf?src-supplier=Digi-Key, ComponentLink7Description=https://datasheet.ciiva.com/144/mlccorderingcode-144630.pdf?src-supplier=Digi-Key, ComponentLink7URL=https://datasheet.ciiva.com/144/mlccorderingcode-144630.pdf?src-supplier=Digi-Key, ComponentLink8Description=https://datasheet.ciiva.com/11464/upy-gp-np0-16v-to-50v-8-11464725.pdf?src-supplier=Avnet, ComponentLink8URL=https://datasheet.ciiva.com/11464/upy-gp-np0-16v-to-50v-8-11464725.pdf?src-supplier=Avnet, ComponentLink9Description=https://datasheet.ciiva.com/26829/getdatasheetpartid-403525-26829372.pdf?src-supplier=Verical, ComponentLink9URL=https://datasheet.ciiva.com/26829/getdatasheetpartid-403525-26829372.pdf?src-supplier=Verical, Depth=0.8mm, Height=0.8mm, Lead Free="Lead Free", Length=1.6mm, Manufacturer Part Number=CC0603JRNPO9BN101, Mount="Surface Mount", Number of Pins=2, Packaging="Tape and Reel", Pricing 1="1=0.06030, 10=0.04400, 25=0.02170, 100=0.01580, 250=0.01330, 500=0.01300, 1000=0.01150, 3000=0.01010, 6000=0.00680 (USD)", Radiation Hardening=No, REACH SVHC=Unknown, RoHS=Yes, RoHS Compliant=Yes, Series=CC, Stock 1=10744, Supplier 1="Arrow Electronics", Supplier Part Number 1=CC0603JRNPO9BN101, Termination=SMD/SMT, Thickness=0.035inch, Voltage Rating=50V, Voltage Rating (DC)=50V, Width=0.8mm
C6: library part CC0603KRX7R9BB331, "CAP CER 330PF 50V X7R 0603", LCSC Part Number=C107087, Manufacturer=Yageo, Supplier Part Number=4215935, Category="Ceramic Capacitors", ComponentLink1Description=https://datasheet.ciiva.com/144/mlccorderingcode-144454.pdf?src-supplier=Digi-Key, ComponentLink1URL=https://datasheet.ciiva.com/144/mlccorderingcode-144454.pdf?src-supplier=Digi-Key, ComponentLink2Description=https://datasheet.ciiva.com/144/mlccorderingcode-144455.pdf?src-supplier=Digi-Key, ComponentLink2URL=https://datasheet.ciiva.com/144/mlccorderingcode-144455.pdf?src-supplier=Digi-Key, ComponentLink3Description=https://datasheet.ciiva.com/144/mlccorderingcode-144456.pdf?src-supplier=Digi-Key, ComponentLink3URL=https://datasheet.ciiva.com/144/mlccorderingcode-144456.pdf?src-supplier=Digi-Key, ComponentLink4Description=https://datasheet.ciiva.com/11465/upy-gphc-x7r-6-3v-to-50v-8-11465240.pdf?src-supplier=Avnet, ComponentLink4URL=https://datasheet.ciiva.com/11465/upy-gphc-x7r-6-3v-to-50v-8-11465240.pdf?src-supplier=Avnet, ComponentLink5Description=https://datasheet.ciiva.com/8033/1489800-8033879.pdf?src-supplier=Element14, ComponentLink5URL=https://datasheet.ciiva.com/8033/1489800-8033879.pdf?src-supplier=Element14, ComponentLink6Description=https://datasheet.ciiva.com/8033/1489800-8033881.pdf?src-supplier=Element14, ComponentLink6URL=https://datasheet.ciiva.com/8033/1489800-8033881.pdf?src-supplier=Element14, ComponentLink7Description=https://datasheet.ciiva.com/7978/1489800-7978174.pdf?src-supplier=Element14, ComponentLink7URL=https://datasheet.ciiva.com/7978/1489800-7978174.pdf?src-supplier=Element14, Item Type=Capacitor, Manufacturer Part Number=CC0603KRX7R9BB331, Pricing="4000=0.0051, 16000=0.0048, 60000=0.0045, 160000=0.0044, 400000=0.0041 (USD)", RoHS=Yes, Stock=856000, Supplier="Future Electronics"
C7: library part CC0603KRX7R9BB223, "CAP CER 0.022UF 50V X7R 0603", Case Code (Imperial)=0603, Case Code (Metric)=1608, Dielectric=X7R, Dielectric Material=Ceramic, Insulation Resistance=100GR, LCSC Part Number=C106222, Manufacturer=Yageo, Max Operating Temperature=125°C, Min Operating Temperature=-55°C, Package Quantity=1, Supplier Part Number 1=311-1370-1-ND, Tolerance=10%, Voltage=50V, Capacitance=22nF, Case/Package=0603, Category="Ceramic Capacitors", ComponentLink1Description=https://datasheet.ciiva.com/8033/70765-8033869.pdf?src-supplier=Element14, ComponentLink1URL=https://datasheet.ciiva.com/8033/70765-8033869.pdf?src-supplier=Element14, ComponentLink2Description=https://datasheet.ciiva.com/28450/1489800-28450639.pdf?src-supplier=Element14, ComponentLink2URL=https://datasheet.ciiva.com/28450/1489800-28450639.pdf?src-supplier=Element14, ComponentLink3Description=https://datasheet.ciiva.com/8033/1489800-8033867.pdf?src-supplier=Element14, ComponentLink3URL=https://datasheet.ciiva.com/8033/1489800-8033867.pdf?src-supplier=Element14, ComponentLink4Description=https://datasheet.ciiva.com/8033/1489800-8033865.pdf?src-supplier=Element14, ComponentLink4URL=https://datasheet.ciiva.com/8033/1489800-8033865.pdf?src-supplier=Element14, ComponentLink5Description=https://datasheet.ciiva.com/156/mlccorderingcode-156178.pdf?src-supplier=Digi-Key, ComponentLink5URL=https://datasheet.ciiva.com/156/mlccorderingcode-156178.pdf?src-supplier=Digi-Key, ComponentLink6Description=https://datasheet.ciiva.com/156/mlccorderingcode-156177.pdf?src-supplier=Digi-Key, ComponentLink6URL=https://datasheet.ciiva.com/156/mlccorderingcode-156177.pdf?src-supplier=Digi-Key, ComponentLink7Description=https://datasheet.ciiva.com/156/mlccorderingcode-156179.pdf?src-supplier=Digi-Key, ComponentLink7URL=https://datasheet.ciiva.com/156/mlccorderingcode-156179.pdf?src-supplier=Digi-Key, ComponentLink8Description=https://datasheet.ciiva.com/11464/upy-gphc-x7r-6-3v-to-50v-8-11464741.pdf?src-supplier=Avnet, ComponentLink8URL=https://datasheet.ciiva.com/11464/upy-gphc-x7r-6-3v-to-50v-8-11464741.pdf?src-supplier=Avnet, Depth=0.8mm, Halogen Free="Halogen Free", Height=0.8mm, Item Type=Capacitor, Lead Free="Lead Free", Length=1.6mm, Manufacturer Part Number=CC0603KRX7R9BB223, Mount="Surface Mount", Number of Pins=2, Packaging="Tape and Reel", Pricing 1="1=0.10000, 10=0.05500, 50=0.03020, 100=0.02460, 500=0.01760, 1000=0.01383 (USD)", Radiation Hardening=No, REACH SVHC="No SVHC", Resistor Type=Ceramic, RoHS=Yes, RoHS Compliant=Yes, Series=CC, Stock 1=119735, Supplier 1=Digi-Key, Termination=SMD/SMT, Thickness=0.035inch, Voltage Rating=50V, Voltage Rating (DC)=50V, Width=0.031inch
C8: library part CC1206JKX7R9BB224, "CAP CER 0.22UF 50V X7R 1206", LCSC Part Number=C527274, Manufacturer=Yageo, Supplier Part Number=4639209, Category="Ceramic Capacitors", ComponentLink1Description=https://datasheet.ciiva.com/13210/upy-gp-np0-16v-to-50v-8-13210060.pdf?src-supplier=Mouser, ComponentLink1URL=https://datasheet.ciiva.com/13210/upy-gp-np0-16v-to-50v-8-13210060.pdf?src-supplier=Mouser, ComponentLink2Description=https://datasheet.ciiva.com/11466/upy-gphc-x7r-6-3v-to-50v-8-11466351.pdf?src-supplier=Avnet, ComponentLink2URL=https://datasheet.ciiva.com/11466/upy-gphc-x7r-6-3v-to-50v-8-11466351.pdf?src-supplier=Avnet, Item Type=Capacitor, Manufacturer Part Number=CC1206JKX7R9BB224, Pricing="3000=0.0381, 9000=0.0366, 15000=0.036, 30000=0.0351, 60000=0.0337 (USD)", RoHS=Yes, Stock=3000, Supplier="Future Electronics"
C9: library part SHW680UF10V6.3X11, "680uF 10V 50mΩ@300kHz ±20% 980mA@100kHz Plugin,D6.3xL11mm Aluminum Electrolytic Capacitors - Leaded ROHS", LCSC Part Number=C494547, Manufacturer=KNSCHA, Package=Plugin,D6.3xL11mm, ComponentLink1Description=LCSC, ComponentLink1URL=https://www.lcsc.com/product-detail/Aluminum-Electrolytic-Capacitors-Leaded_KNSCHA-SHW680UF10V6-3X11_C494547.html, Item Type="Electrolytic Capacitor", Manufacturer Part Number=SHW680UF10V6.3X11
C10 C12 C14: library part CL05A106MP5NUNC, "CAP CER 10UF 10V X5R 0402", Case Code (Imperial)=0402, Case Code (Metric)=1005, Dielectric=X5R, LCSC Part Number=C315248, Manufacturer=Samsung, Max Operating Temperature=85°C, Min Operating Temperature=-55°C, Package Quantity=1, Tolerance=20%, Voltage Rating=10V, Capacitance=10uF, Case/Package=0402, Category="Ceramic Capacitors", ComponentLink1Description=https://datasheet.ciiva.com/25721/cl05a106mp5nunc-25721584.pdf?src-supplier=Digi-Key, ComponentLink1URL=https://datasheet.ciiva.com/25721/cl05a106mp5nunc-25721584.pdf?src-supplier=Digi-Key, ComponentLink2Description=https://datasheet.ciiva.com/26838/getdatasheetpartid-745310-26838170.pdf?src-supplier=Verical, ComponentLink2URL=https://datasheet.ciiva.com/26838/getdatasheetpartid-745310-26838170.pdf?src-supplier=Verical, Construction=Flat, Contact Plating=Tin, Depth=0.5mm, Item Type=Capacitor, Lead Free="Lead Free", Length=1mm, Manufacturer Part Number=CL05A106MP5NUNC, Mount="Surface Mount", Packaging="Tape and Reel", Pricing 1="10000=0.02537 (USD)", Radiation Hardening=No, RoHS=Yes, RoHS Compliant=Yes, Series=CL, Stock 1=1729850, Supplier 1=Avnet, Supplier Part Number 1=CL05A106MP5NUNC, Termination=Wraparound, Thickness=0.028inch, Width=0.02inch
C11 C13 C16 C17 C19 C20 C22 C24 C27 C30 C32: library part GRM033R61E104KE14D, "CAP CER 0.1UF 25V X5R 0201", Case Code (Imperial)=0201, Case Code (Metric)=0603, Dielectric=X5R, LCSC Part Number=C76939, Manufacturer=Murata, Max Operating Temperature=85°C, Min Operating Temperature=-55°C, Package Quantity=15000, Supplier Part Number=1852066, Tolerance=10%, Voltage Rating=25V, Case/Package=0201, Category="Ceramic Capacitors", ComponentLink1Description=http://www.farnell.com/datasheets/2867843.pdf?src-supplier=Farnell, ComponentLink1URL=http://www.farnell.com/datasheets/2867843.pdf?src-supplier=Farnell, ComponentLink2Description=http://www.mouser.com/ds/2/281/c02e-2905.pdf?src-supplier=Mouser, ComponentLink2URL=http://www.mouser.com/ds/2/281/c02e-2905.pdf?src-supplier=Mouser, ComponentLink3Description=https://datasheet.octopart.com/GRM033R61E104KE14D-Murata-datasheet-22122223.pdf?src-supplier=Future+Electronics, ComponentLink3URL=https://datasheet.octopart.com/GRM033R61E104KE14D-Murata-datasheet-22122223.pdf?src-supplier=Future+Electronics, ComponentLink4Description=http://www.farnell.com/datasheets/2867843.pdf?src-supplier=Element14, ComponentLink4URL=http://www.farnell.com/datasheets/2867843.pdf?src-supplier=Element14, ComponentLink5Description=http://search.murata.co.jp/Ceramy/image/img/A01X/G101/ENG/GRM033R61E104KE14-01.pdf?src-supplier=Digi-Key, ComponentLink5URL=http://search.murata.co.jp/Ceramy/image/img/A01X/G101/ENG/GRM033R61E104KE14-01.pdf?src-supplier=Digi-Key, ComponentLink6Description=http://www.farnell.com/datasheets/2867843.pdf?src-supplier=Newark, ComponentLink6URL=http://www.farnell.com/datasheets/2867843.pdf?src-supplier=Newark, ComponentLink7Description=https://datasheet.octopart.com/GRM033R61E104KE14D-Murata-datasheet-165579666.pdf?src-supplier=TME, ComponentLink7URL=https://datasheet.octopart.com/GRM033R61E104KE14D-Murata-datasheet-165579666.pdf?src-supplier=TME, Height=0.3mm, Item Type=Capacitor, Lead Free="Lead Free", Length=0.024inch, Manufacturer Part Number=GRM033R61E104KE14D, Material=4241ConductorMaterial, Mounting Technology="Surface Mount", Packaging="Tape and Reel", Pricing="1000=0.008, 5000=0.007, 10000=0.006 (GBP)", RoHS=Yes, RoHS Compliant=Yes, Series=GRM, Stock=14000, Supplier=Rs, Termination=SMD/SMT, Thickness=0.013inch, Voltage Rating (DC)=25V, Weight=1.2E-05oz, Width=0.012inch
C15 C21 C33: library part GRM033R61C105ME15D, "CAP CER 1UF 16V X5R 0201", LCSC Part Number=C335102, Manufacturer=Murata, Supplier Part Number 1=490-18654-1-ND, Category="Ceramic Capacitors", ComponentLink1Description=https://datasheet.octopart.com/GRM033R61C105ME15D-Murata-datasheet-155345049.pdf?src-supplier=Element14, ComponentLink1URL=https://datasheet.octopart.com/GRM033R61C105ME15D-Murata-datasheet-155345049.pdf?src-supplier=Element14, ComponentLink2Description=https://datasheet.octopart.com/GRM033R61C105ME15D-Murata-datasheet-165579666.pdf?src-supplier=TME, ComponentLink2URL=https://datasheet.octopart.com/GRM033R61C105ME15D-Murata-datasheet-165579666.pdf?src-supplier=TME, Item Type=Capacitor, Manufacturer Part Number=GRM033R61C105ME15D, Pricing 1="1=0.14, 10=0.098, 50=0.0554, 100=0.0459, 500=0.0322, 1000=0.02665, 2500=0.02481, 5000=0.0227 (USD)", RoHS=No, Stock 1=12823, Supplier 1=Digi-Key
C18: library part CC0402KRX5R7BB105, "CAP CER 1UF 16V X5R 0402", Case Code (Imperial)=0402, Case Code (Metric)=1005, Dielectric=X5R, LCSC Part Number=C325464, Manufacturer=Yageo, Max Operating Temperature=85°C, Min Operating Temperature=-55°C, Supplier Part Number 1=311-1691-6-ND, Tolerance=10%, Voltage Rating=16V, Capacitance=1uF, Case/Package=0402, ComponentLink1Description=http://www.yageo.com/documents/recent/UPY-GPHC_X5R_4V-to-50V_12.pdf?src-supplier=Avnet+Europe, ComponentLink1URL=http://www.yageo.com/documents/recent/UPY-GPHC_X5R_4V-to-50V_12.pdf?src-supplier=Avnet+Europe, Composition=Ceramic, Depth=0.5mm, Halogen Free="Halogen Free", Height=0.5mm, Item Type=Capacitor, Lead Free="Lead Free", Length=1mm, Manufacturer Part Number=CC0402KRX5R7BB105, Mount="Surface Mount", Packaging="Tape and Reel", Pricing 1="1=0.36, 10=0.252, 100=0.1512, 500=0.1134, 1000=0.09576, 2500=0.09072, 5000=0.08568 (USD)", Radiation Hardening=No, Stock 1=1405667, Supplier 1=Digi-Key, Termination=SMD/SMT, Thickness=0.022inch, Voltage Rating (DC)=16V, Weight=2.3E-05oz, Width=0.02inch
C25 C26: library part GRM0335C1H220JA01D, "CAP CER 22PF 50V C0G/NP0 0201", Case Code (Imperial)=0201, Case Code (Metric)=0603, Dielectric=C0G, LCSC Part Number=C76924, Manufacturer=Murata, Max Operating Temperature=125°C, Min Operating Temperature=-55°C, Package Quantity=1, Supplier Part Number=8202728, Temperature Coefficient=30ppm/°C, Tolerance=5%, Voltage=50V, Case/Package=0201, Category="Ceramic Capacitors", ComponentLink1Description=https://datasheet.ciiva.com/6271/partnumbering-e-01-6271146.pdf?src-supplier=Digi-Key, ComponentLink1URL=https://datasheet.ciiva.com/6271/partnumbering-e-01-6271146.pdf?src-supplier=Digi-Key, ComponentLink2Description=https://datasheet.ciiva.com/6271/partnumbering-e-01-6271143.pdf?src-supplier=Digi-Key, ComponentLink2URL=https://datasheet.ciiva.com/6271/partnumbering-e-01-6271143.pdf?src-supplier=Digi-Key, ComponentLink3Description=https://datasheet.ciiva.com/6271/partnumbering-e-01-6271149.pdf?src-supplier=Digi-Key, ComponentLink3URL=https://datasheet.ciiva.com/6271/partnumbering-e-01-6271149.pdf?src-supplier=Digi-Key, Depth=0.3mm, Height=0.3mm, Item Type=Capacitor, Lead Free="Lead Free", Length=0.024inch, Manufacturer Part Number=GRM0335C1H220JA01D, Material=4241ConductorMaterial, Mounting Technology="Surface Mount", Packaging="Tape and Reel", Pricing="500=0.004, 5000=0.003, 12500=0.002, 50000=0.002 (GBP)", RoHS=Yes, RoHS Compliant=Yes, Series=GRM, Stock=9500, Supplier=Rs, Termination=SMD/SMT, Voltage Rating=50V, Voltage Rating (DC)=50V, Width=0.012inch
C28: library part CC0201CRNPO9BN2R7, "CAP CER 2.7PF 50V C0G/NPO 0201", Case Code (Imperial)=0201, Case Code (Metric)=0603, Dielectric=C0G, LCSC Part Number=C325439, Manufacturer=Yageo, Max Operating Temperature=125°C, Min Operating Temperature=-55°C, Voltage Rating=50V, Case/Package=0201, Category="Ceramic Capacitors", ComponentLink1Description=https://datasheet.ciiva.com/13208/upy-gp-np0-16v-to-50v-8-13208314.pdf?src-supplier=Mouser, ComponentLink1URL=https://datasheet.ciiva.com/13208/upy-gp-np0-16v-to-50v-8-13208314.pdf?src-supplier=Mouser, Item Type=Capacitor, Length=0.024inch, Manufacturer Part Number=CC0201CRNPO9BN2R7, Mounting Technology="Surface Mount", Packaging="Tape and Reel", Pricing="15000=0.0017 (USD)", RoHS=Yes, RoHS Compliant=Yes, Series=CC, Stock=15000, Supplier=Avnet, Supplier Part Number=CC0201CRNPO9BN2R7, Termination=SMD/SMT, Thickness=0.013inch, Voltage Rating (DC)=50V, Weight=6E-06oz, Width=0.012inch
C29: library part CC0201BRNPO9BN4R7, "CAP CER 4.7PF 50V C0G/NPO 0201", Case/Package=0201, LCSC Part Number=C505471, Manufacturer=Yageo, Max Operating Temperature=125°C, Min Operating Temperature=-55°C, Voltage Rating=50V, Category="Ceramic Capacitors", ComponentLink1Description=https://www.yageo.com/upload/media/product/productsearch/datasheet/mlcc/UPY-GP_NP0_16V-to-50V_18.pdf?src-supplier=Digi-Key, ComponentLink1URL=https://www.yageo.com/upload/media/product/productsearch/datasheet/mlcc/UPY-GP_NP0_16V-to-50V_18.pdf?src-supplier=Digi-Key, ComponentLink2Description=http://www.yageo.com/documents/recent/UPY-GP_NP0_16V-to-50V_16.pdf?src-supplier=Digi-Key, ComponentLink2URL=http://www.yageo.com/documents/recent/UPY-GP_NP0_16V-to-50V_16.pdf?src-supplier=Digi-Key, Item Type=Capacitor, Length=0.024inch, Manufacturer Part Number=CC0201BRNPO9BN4R7, Mounting Technology="Surface Mount", Packaging="Tape and Reel", Pricing="15000=0.0023 (USD)", RoHS=Yes, RoHS Compliant=Yes, Series=CC, Stock=210000, Supplier="Arrow Electronics", Supplier Part Number=CC0201BRNPO9BN4R7, Thickness=0.013inch, Width=0.012inch
C31: library part TAJB336K010RNJ, "CAP TANT 33UF 10% 10V 1411", Case Code (Imperial)=1210, Case Code (Metric)=3528, Dielectric Material=Tantalum, ESR (Equivalent Series Resistance)=1.8R, LCSC Part Number=C7202, Leakage Current=3.3uA, Manufacturer="Kyocera AVX", Max Operating Temperature=125°C, Min Operating Temperature=-55°C, Package Quantity=1, Supplier Part Number 1=1364604P, Tolerance=10%, Voltage=10V, Case/Package=1210, Category="Tantalum Capacitors", ComponentLink1Description=https://datasheet.ciiva.com/26341/559435-da-01-en-tacc-b-3-2-mm-x-2-5-mm-x-1-9-mm-33-uf-26341776.pdf?src-supplier=Conrad, ComponentLink1URL=https://datasheet.ciiva.com/26341/559435-da-01-en-tacc-b-3-2-mm-x-2-5-mm-x-1-9-mm-33-uf-26341776.pdf?src-supplier=Conrad, ComponentLink2Description=https://datasheet.ciiva.com/7775/49917-7775706.pdf?src-supplier=Element14, ComponentLink2URL=https://datasheet.ciiva.com/7775/49917-7775706.pdf?src-supplier=Element14, ComponentLink3Description=https://datasheet.ciiva.com/7775/49917-7775705.pdf?src-supplier=Element14, ComponentLink3URL=https://datasheet.ciiva.com/7775/49917-7775705.pdf?src-supplier=Element14, ComponentLink4Description=https://datasheet.ciiva.com/7775/1680476-7775704.pdf?src-supplier=Element14, ComponentLink4URL=https://datasheet.ciiva.com/7775/1680476-7775704.pdf?src-supplier=Element14, ComponentLink5Description=https://datasheet.ciiva.com/264/taj-264134.pdf?src-supplier=Digi-Key, ComponentLink5URL=https://datasheet.ciiva.com/264/taj-264134.pdf?src-supplier=Digi-Key, ComponentLink6Description=https://datasheet.ciiva.com/264/taj-264133.pdf?src-supplier=Digi-Key, ComponentLink6URL=https://datasheet.ciiva.com/264/taj-264133.pdf?src-supplier=Digi-Key, ComponentLink7Description=https://datasheet.ciiva.com/264/taj-264135.pdf?src-supplier=Digi-Key, ComponentLink7URL=https://datasheet.ciiva.com/264/taj-264135.pdf?src-supplier=Digi-Key, ComponentLink8Description=https://datasheet.ciiva.com/12884/taj-27497-12884279.pdf?src-supplier=Mouser, ComponentLink8URL=https://datasheet.ciiva.com/12884/taj-27497-12884279.pdf?src-supplier=Mouser, ComponentLink9Description=https://datasheet.ciiva.com/14590/70001050-14590215.pdf?src-supplier=Allied+Electronics, ComponentLink9URL=https://datasheet.ciiva.com/14590/70001050-14590215.pdf?src-supplier=Allied+Electronics, ComponentLink10Description=https://datasheet.ciiva.com/14592/70001050-14592670.pdf?src-supplier=Allied+Electronics, ComponentLink10URL=https://datasheet.ciiva.com/14592/70001050-14592670.pdf?src-supplier=Allied+Electronics, ComponentLink11Description=https://datasheet.ciiva.com/11224/taj-11224937.pdf?src-supplier=Avnet, ComponentLink11URL=https://datasheet.ciiva.com/11224/taj-11224937.pdf?src-supplier=Avnet, ComponentLink12Description=https://datasheet.ciiva.com/16492/taj-16492863.pdf?src-supplier=Future+Electronics, ComponentLink12URL=https://datasheet.ciiva.com/16492/taj-16492863.pdf?src-supplier=Future+Electronics, ComponentLink13Description=https://datasheet.ciiva.com/11224/taj-11224941.pdf?src-supplier=Avnet, ComponentLink13URL=https://datasheet.ciiva.com/11224/taj-11224941.pdf?src-supplier=Avnet, Construction=Flat, Depth=2.8mm, Dissipation Factor=6%, Features="General Purpose", Height=1.9mm, Height - Seated (Max)=0.083inch, Item Type=Capacitor, Lead Free="Lead Free", Lead Pitch=1.4mm, Length=3.5mm, Manufacturer Part Number=TAJB336K010RNJ, Mounting Technology="Surface Mount,PCB", Packaging="Tape and Reel", Pins=2, Polarity=Polar, Pricing 1="100=0.01410, 400=0.24800, 1000=0.21600 (GBP)", Radiation Hardening=No, Reach SVHC Compliant=Yes, RoHS=Yes, RoHS Compliant=Yes, Series=TAJ, Stock 1=1580, Supplier 1=Rs, Termination=SMD/SMT, Voltage Rating=10V, Voltage Rating (DC)=10V, Width=2.8mm
D1 D2: "DIODE GEN PURP 1KV 1A SMA", Average Rectified Current=1A, Case/Package=SMA, Forward Voltage=1.18V, LCSC Part Number=C47921, Manufacturer="ON Semiconductor", Max Forward Surge Current (Ifsm)=30A, Max Operating Temperature=175°C, Max Repetitive Reverse Voltage (Vrrm)=1kV, Max Reverse Current=10uA, Min Operating Temperature=-55°C, Package Quantity=1, Category="Rectifier Diodes", ComponentLink1Description=https://datasheet.ciiva.com/34303/2013551-34303843.pdf?src-supplier=Jameco, ComponentLink1URL=https://datasheet.ciiva.com/34303/2013551-34303843.pdf?src-supplier=Jameco, ComponentLink2Description=https://datasheet.ciiva.com/30479/0900766b8078eb75-30479272.pdf?src-supplier=Rs, ComponentLink2URL=https://datasheet.ciiva.com/30479/0900766b8078eb75-30479272.pdf?src-supplier=Rs, ComponentLink3Description=https://datasheet.ciiva.com/7962/mra4003t3-d-7962843.pdf?src-supplier=Element14, ComponentLink3URL=https://datasheet.ciiva.com/7962/mra4003t3-d-7962843.pdf?src-supplier=Element14, ComponentLink4Description=https://datasheet.ciiva.com/7962/mra4003t3-d-7962842.pdf?src-supplier=Element14, ComponentLink4URL=https://datasheet.ciiva.com/7962/mra4003t3-d-7962842.pdf?src-supplier=Element14, ComponentLink5Description=https://datasheet.ciiva.com/22749/1747991-22749573.pdf?src-supplier=Element14, ComponentLink5URL=https://datasheet.ciiva.com/22749/1747991-22749573.pdf?src-supplier=Element14, ComponentLink6Description=https://datasheet.ciiva.com/14558/70099554-14558476.pdf?src-supplier=Allied+Electronics, ComponentLink6URL=https://datasheet.ciiva.com/14558/70099554-14558476.pdf?src-supplier=Allied+Electronics, ComponentLink7Description=https://datasheet.ciiva.com/8299/mra4003t3-d-8299900.pdf?src-supplier=Avnet, ComponentLink7URL=https://datasheet.ciiva.com/8299/mra4003t3-d-8299900.pdf?src-supplier=Avnet, Current Rating=1A, Forward Current=1A, Height=2mm, Item Type=Diode, Lead Free="Lead Free", Length=4.32mm, Manufacturer Part Number=MRA4007T3G, Max Reverse Voltage (DC)=1kV, Max Surge Current=30A, Output Current=1A, Packaging="Tape and Reel", Peak Non-Repetitive Surge Current=30A, Pins=2, Polarity=Standard, Pricing="20000=0.0492, 25000=0.0487, 50000=0.0483, 100000=0.0476 (USD)", Radiation Hardening=No, Reach SVHC Compliant=No, Reverse Voltage=1kV, RoHS=Yes, RoHS Compliant=Yes, Series=-, Stock=240000, Supplier="Arrow Electronics", Supplier Part Number=MRA4007T3G, Voltage Rating (DC)=1kV, Width=2.6mm
D3: "DIODE SCHOTTKY 100V 150MA SOD123", Average Rectified Current=150mA, Current Rating=160mA, Forward Voltage=1V, LCSC Part Number=C283255, Manufacturer=STMicroelectronics, Max Forward Surge Current (Ifsm)=1A, Max Operating Temperature=150°C, Max Repetitive Reverse Voltage (Vrrm)=100V, Max Reverse Current=5uA, Min Operating Temperature=-65°C, Package Quantity=3000, Supplier Part Number=511-BAT46ZFILM, Category="Rectifier Diodes", ComponentLink1Description=https://datasheet.ciiva.com/23920/cd00004930-23920128.pdf?src-supplier=Newark, ComponentLink1URL=https://datasheet.ciiva.com/23920/cd00004930-23920128.pdf?src-supplier=Newark, ComponentLink2Description=https://datasheet.ciiva.com/14168/cd00004930-14168058.pdf?src-supplier=Distrelec, ComponentLink2URL=https://datasheet.ciiva.com/14168/cd00004930-14168058.pdf?src-supplier=Distrelec, ComponentLink3Description=https://datasheet.ciiva.com/4714/cd00004930-111868-4714530.pdf?src-supplier=Mouser, ComponentLink3URL=https://datasheet.ciiva.com/4714/cd00004930-111868-4714530.pdf?src-supplier=Mouser, ComponentLink4Description=https://datasheet.ciiva.com/17097/bat46zfilm-17097700.pdf?src-supplier=Allied+Electronics, ComponentLink4URL=https://datasheet.ciiva.com/17097/bat46zfilm-17097700.pdf?src-supplier=Allied+Electronics, ComponentLink5Description=https://datasheet.ciiva.com/22733/1761349-22733179.pdf?src-supplier=Element14, ComponentLink5URL=https://datasheet.ciiva.com/22733/1761349-22733179.pdf?src-supplier=Element14, ComponentLink6Description=https://datasheet.ciiva.com/915/cd00004930-915572.pdf?src-supplier=Digi-Key, ComponentLink6URL=https://datasheet.ciiva.com/915/cd00004930-915572.pdf?src-supplier=Digi-Key, ComponentLink7Description=https://datasheet.ciiva.com/915/cd00004930-915571.pdf?src-supplier=Digi-Key, ComponentLink7URL=https://datasheet.ciiva.com/915/cd00004930-915571.pdf?src-supplier=Digi-Key, ComponentLink8Description=https://datasheet.ciiva.com/915/cd00004930-915573.pdf?src-supplier=Digi-Key, ComponentLink8URL=https://datasheet.ciiva.com/915/cd00004930-915573.pdf?src-supplier=Digi-Key, ComponentLink9Description=https://datasheet.ciiva.com/16221/cd00004930-16221159.pdf?src-supplier=Future+Electronics, ComponentLink9URL=https://datasheet.ciiva.com/16221/cd00004930-16221159.pdf?src-supplier=Future+Electronics, ComponentLink10Description=https://datasheet.ciiva.com/15144/getdatasheetpartid-89559-15144645.pdf?src-supplier=Verical, ComponentLink10URL=https://datasheet.ciiva.com/15144/getdatasheetpartid-89559-15144645.pdf?src-supplier=Verical, Forward Current=150mA, Height=1.35mm, Item Type="Schottky Diode", Lead Free="Lead Free", Length=2.85mm, Manufacturer Part Number=BAT46ZFILM, Max Reverse Leakage Current=5uA, Max Reverse Voltage (DC)=100V, Max Surge Current=1A, Mounting Technology="Surface Mount", Output Current=150mA, Packaging="Tape and Reel", Peak Non-Repetitive Surge Current=1A, Pins=2, Polarity=Standard, Pricing="1=0.44, 10=0.307, 50=0.307, 100=0.124, 1000=0.093, 10000=0.064 (USD)", Radiation Hardening=No, Reach SVHC Compliant=No, RoHS=Yes, RoHS Compliant=Yes, Series=-, Stock=123459, Supplier=Mouser, Voltage Rating (DC)=100V, Width=1.7mm
D4 D5: "Diode Standard 600V 1A Surface Mount SMA", Average Rectified Current=1A, Case/Package=SMA, Forward Voltage=1.3V, LCSC Part Number=C98801, Manufacturer=STMicroelectronics, Max Forward Surge Current (Ifsm)=10A, Max Operating Temperature=175°C, Max Repetitive Reverse Voltage (Vrrm)=600V, Max Reverse Current=1uA, Max Surge Current=20A, Min Operating Temperature=-65°C, Package Quantity=1, Supplier Part Number=511-STTH1L06A, Category="Rectifier Diodes", ComponentLink1Description=https://datasheet.ciiva.com/915/cd00002694-915859.pdf?src-supplier=Digi-Key, ComponentLink1URL=https://datasheet.ciiva.com/915/cd00002694-915859.pdf?src-supplier=Digi-Key, ComponentLink2Description=https://datasheet.ciiva.com/915/cd00002694-915858.pdf?src-supplier=Digi-Key, ComponentLink2URL=https://datasheet.ciiva.com/915/cd00002694-915858.pdf?src-supplier=Digi-Key, ComponentLink3Description=https://datasheet.ciiva.com/915/cd00002694-915860.pdf?src-supplier=Digi-Key, ComponentLink3URL=https://datasheet.ciiva.com/915/cd00002694-915860.pdf?src-supplier=Digi-Key, ComponentLink4Description=https://datasheet.ciiva.com/7964/1671053-7964013.pdf?src-supplier=Element14, ComponentLink4URL=https://datasheet.ciiva.com/7964/1671053-7964013.pdf?src-supplier=Element14, ComponentLink5Description=https://datasheet.ciiva.com/7964/1671053-7964014.pdf?src-supplier=Element14, ComponentLink5URL=https://datasheet.ciiva.com/7964/1671053-7964014.pdf?src-supplier=Element14, ComponentLink6Description=https://datasheet.ciiva.com/26818/getdatasheetpartid-65243-26818021.pdf?src-supplier=Verical, ComponentLink6URL=https://datasheet.ciiva.com/26818/getdatasheetpartid-65243-26818021.pdf?src-supplier=Verical, Current Rating=1A, Forward Current=1A, Height=2.03mm, Item Type=Diode, Lead Free="Lead Free", Length=4.6mm, Manufacturer Part Number=STTH1L06A, Max Reverse Voltage (DC)=600V, Mounting Technology="Surface Mount", Output Current=1A, Packaging="Tape and Reel", Peak Non-Repetitive Surge Current=20A, Pins=2, Polarity=Standard, Pricing="1=0.44, 10=0.377, 50=0.377, 100=0.283, 1000=0.163, 10000=0.138 (USD)", Radiation Hardening=No, Reach SVHC Compliant=No, Recovery Time=80ns, Reverse Recovery Time=80ns, Reverse Recovery Time-Max=80ns, Reverse Voltage=600V, RoHS=Yes, RoHS Compliant=Yes, Series=-, Stock=400, Supplier=Mouser, Voltage Rating (DC)=600V, Width=2.95mm